# Altium PCB main.PcbDoc (part 1 of 2)
Units mm, origin at the board's own origin, x right, y up, seen from the top; angles counter-clockwise.
Board outline 42 x 60.8 mm, 6 copper layers (Layer 1, Layer 2, Layer3, Layer4, Layer 5, Layer 6), stack 0.816 mm thick; 77 components, 64 nets, 292 pads, 154 vias.
Unrouted connection lines stored in the file: 1.
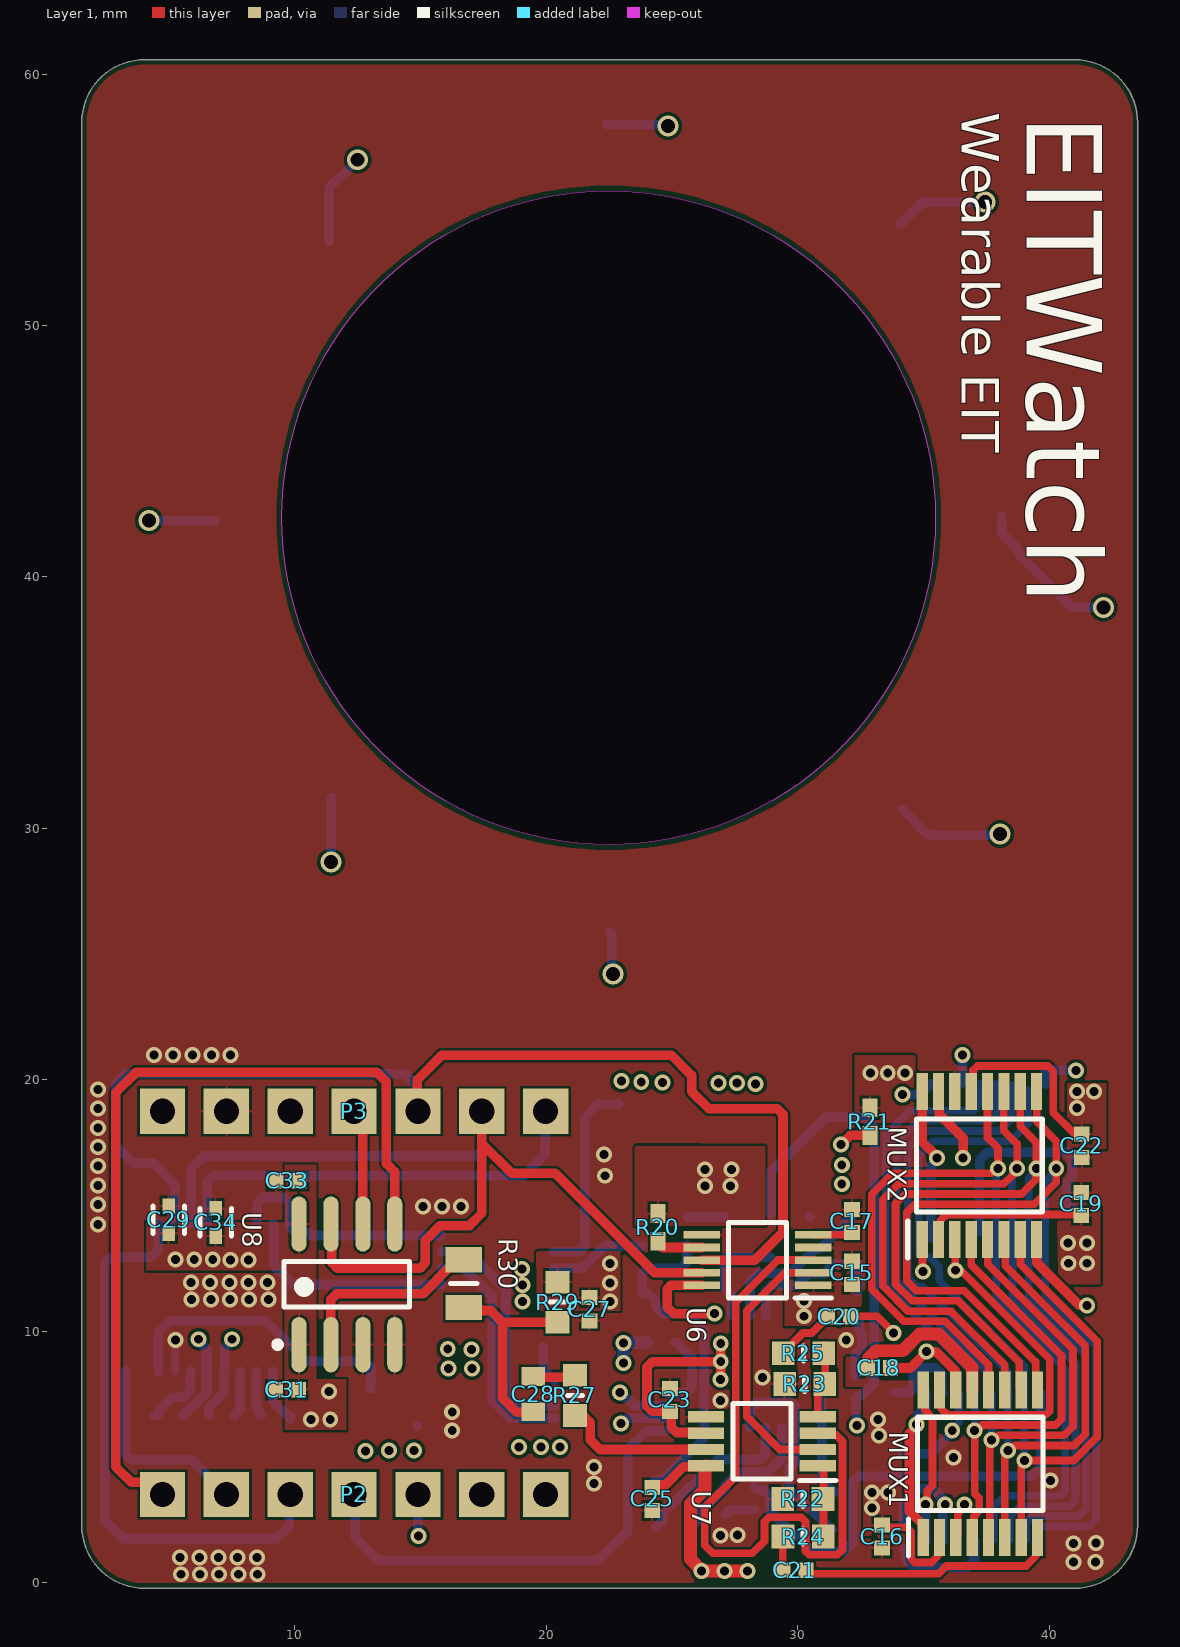
[diagram p0: Layer 1 view]
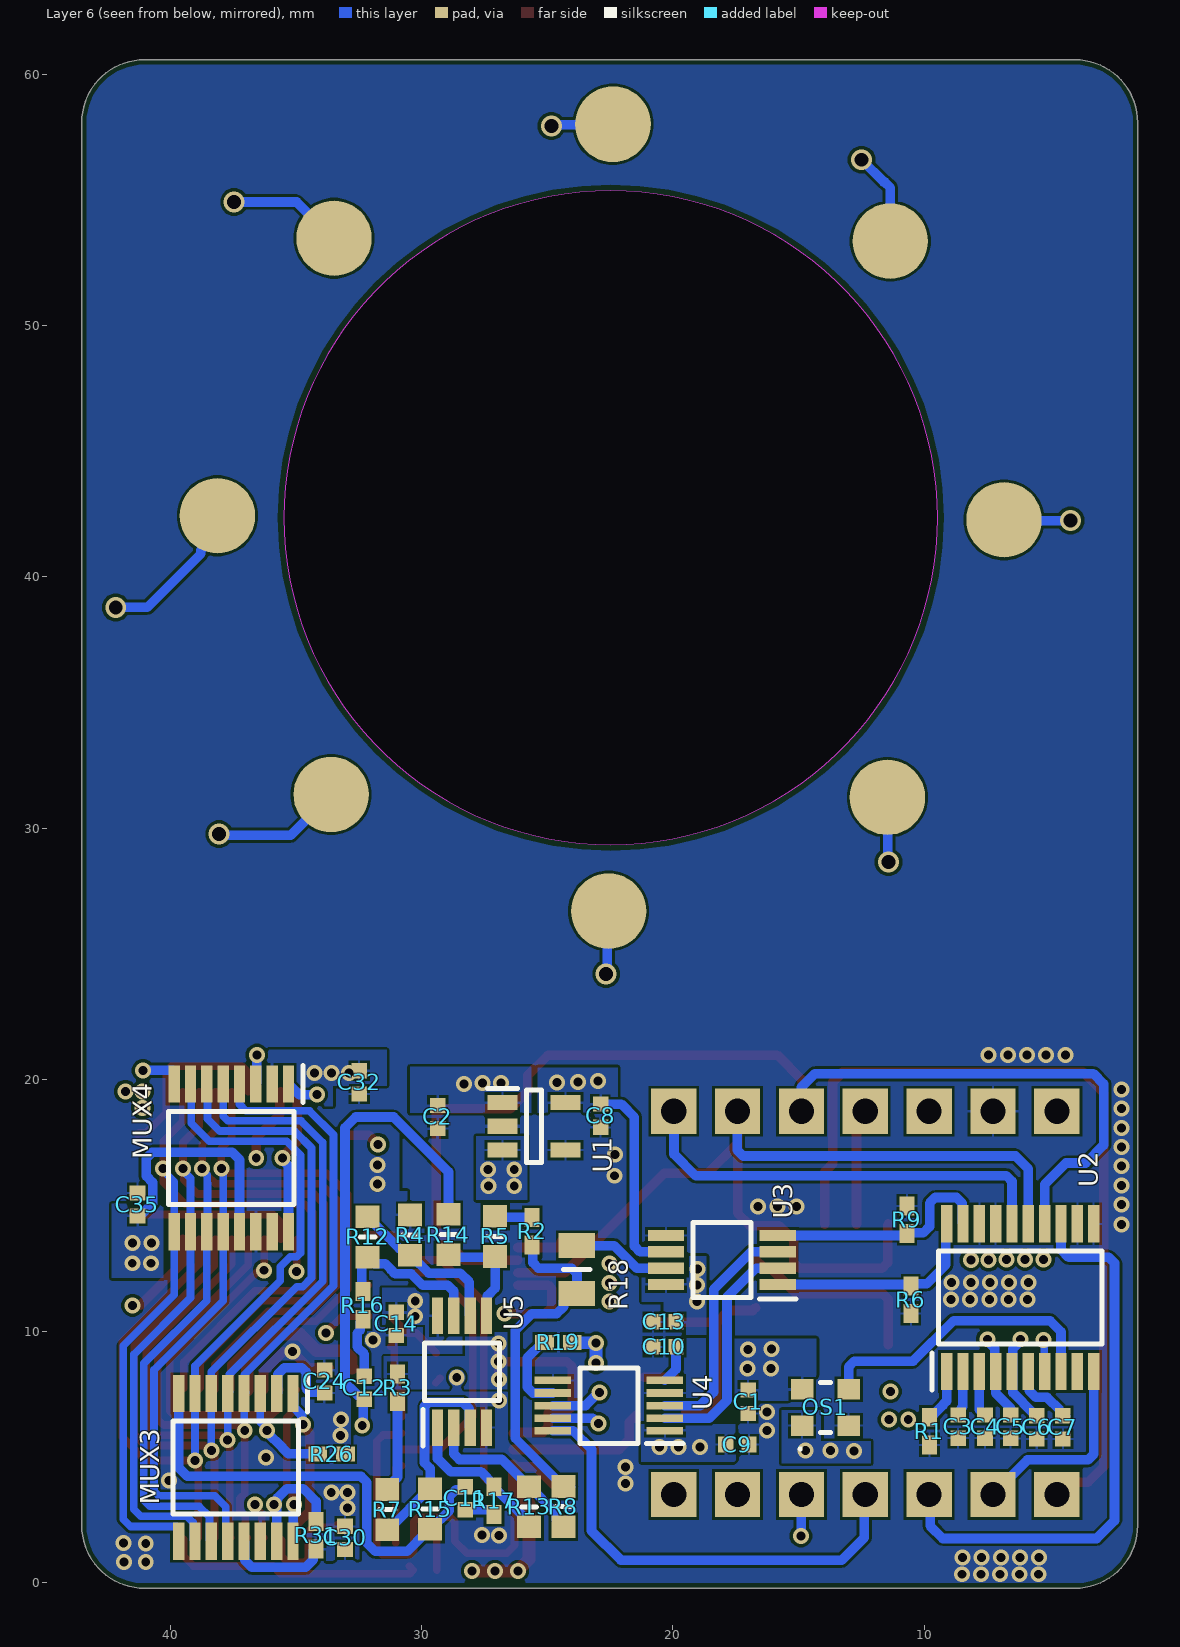
[diagram p1: Layer 6 view, seen from below]
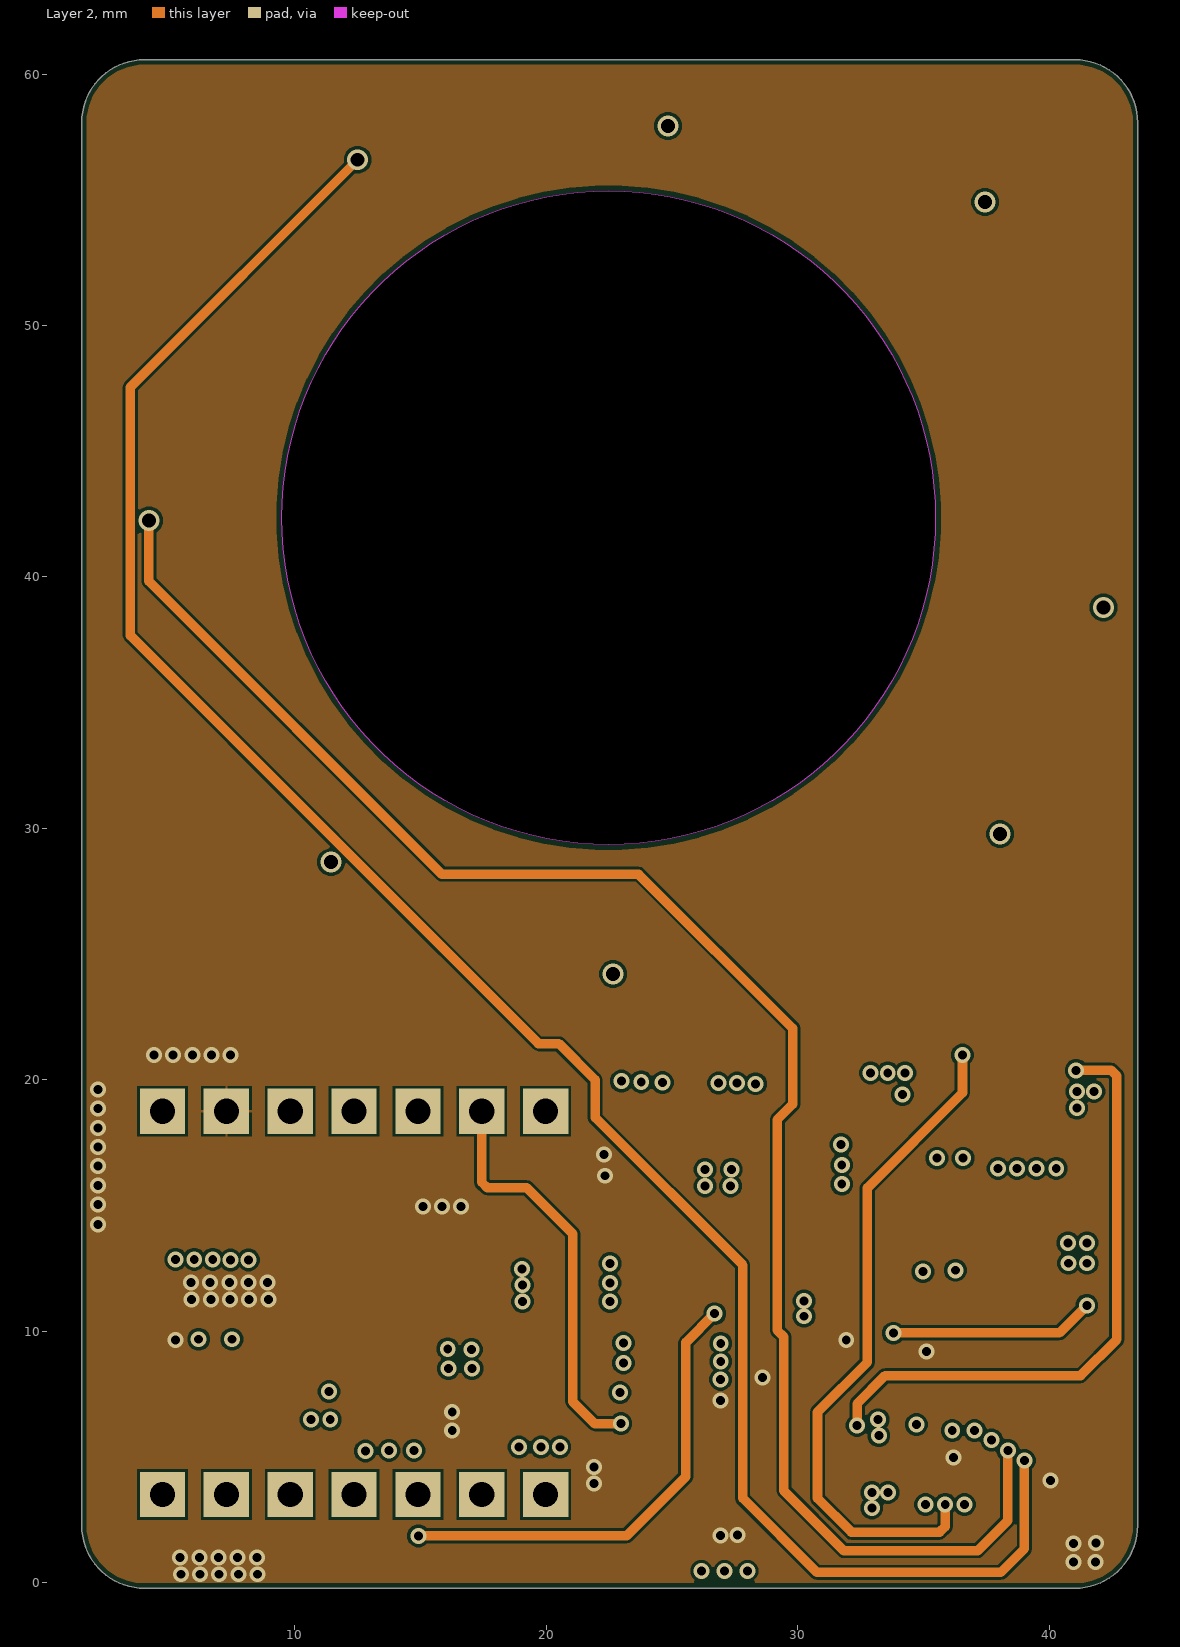
[diagram p2: Layer 2]
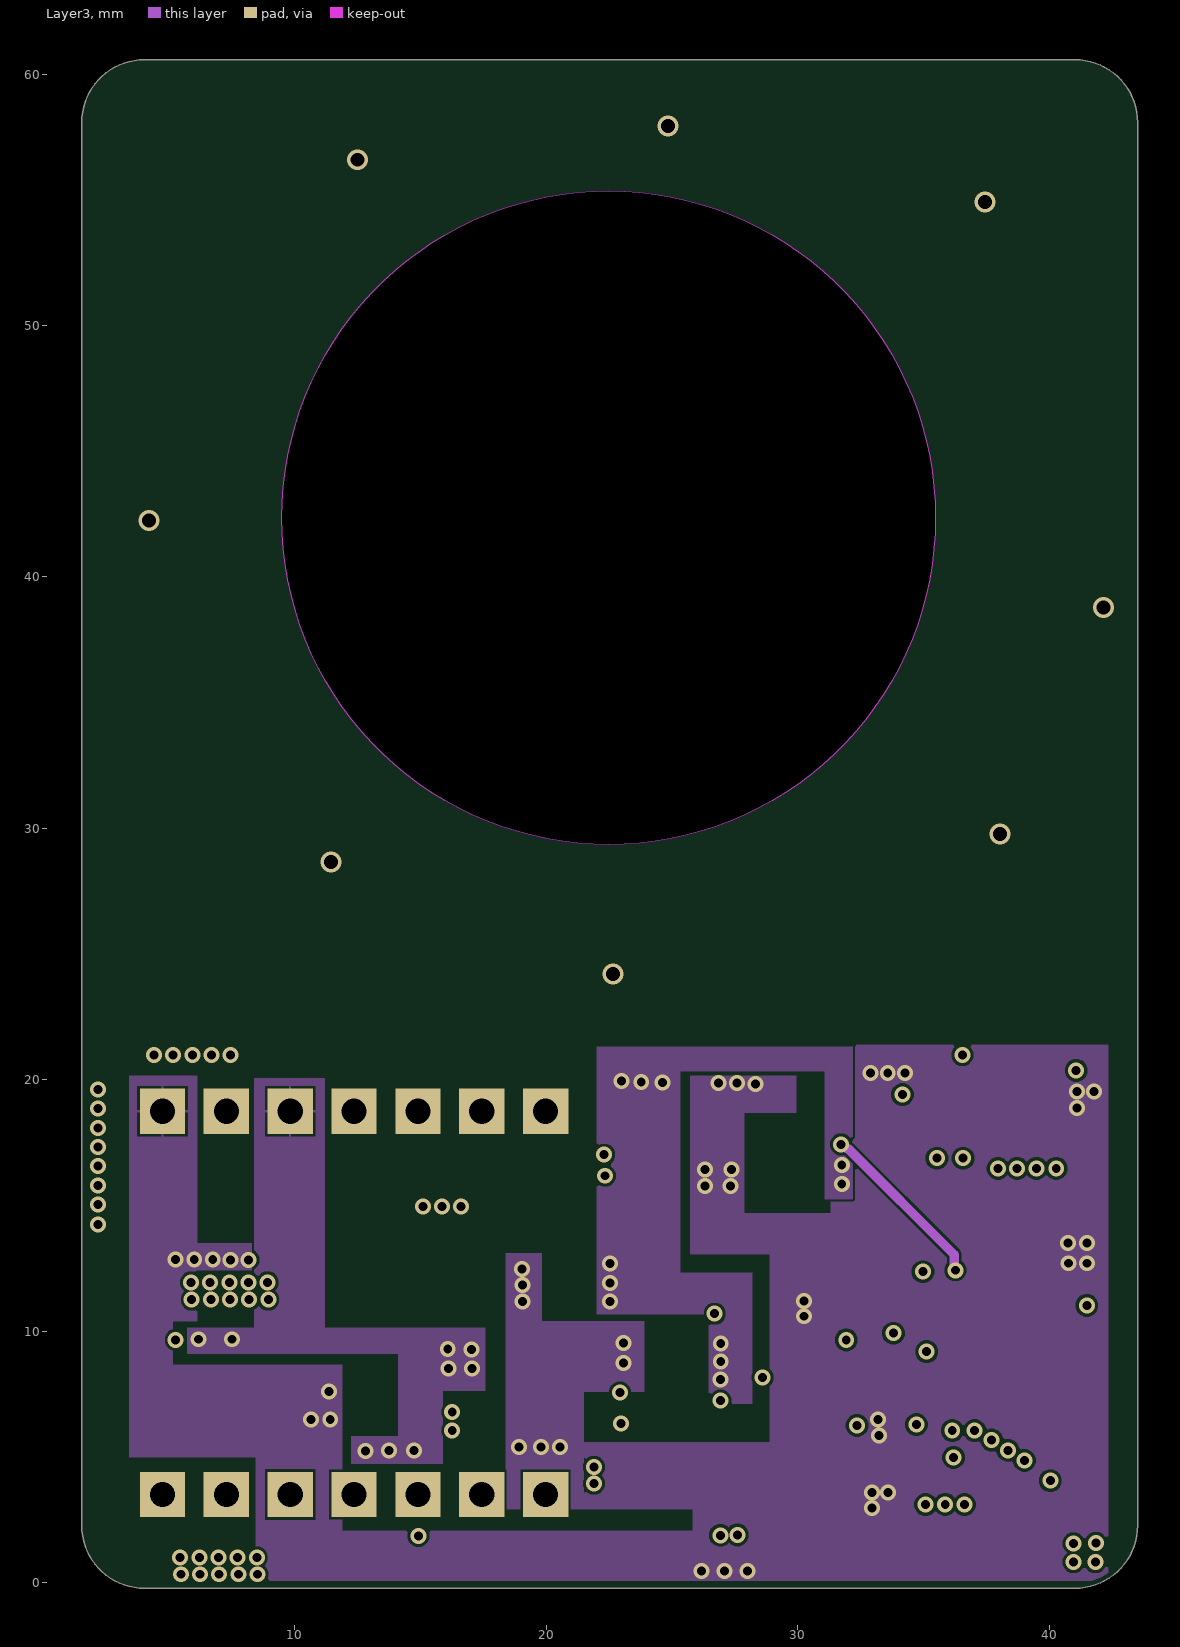
[diagram p3: Layer3]
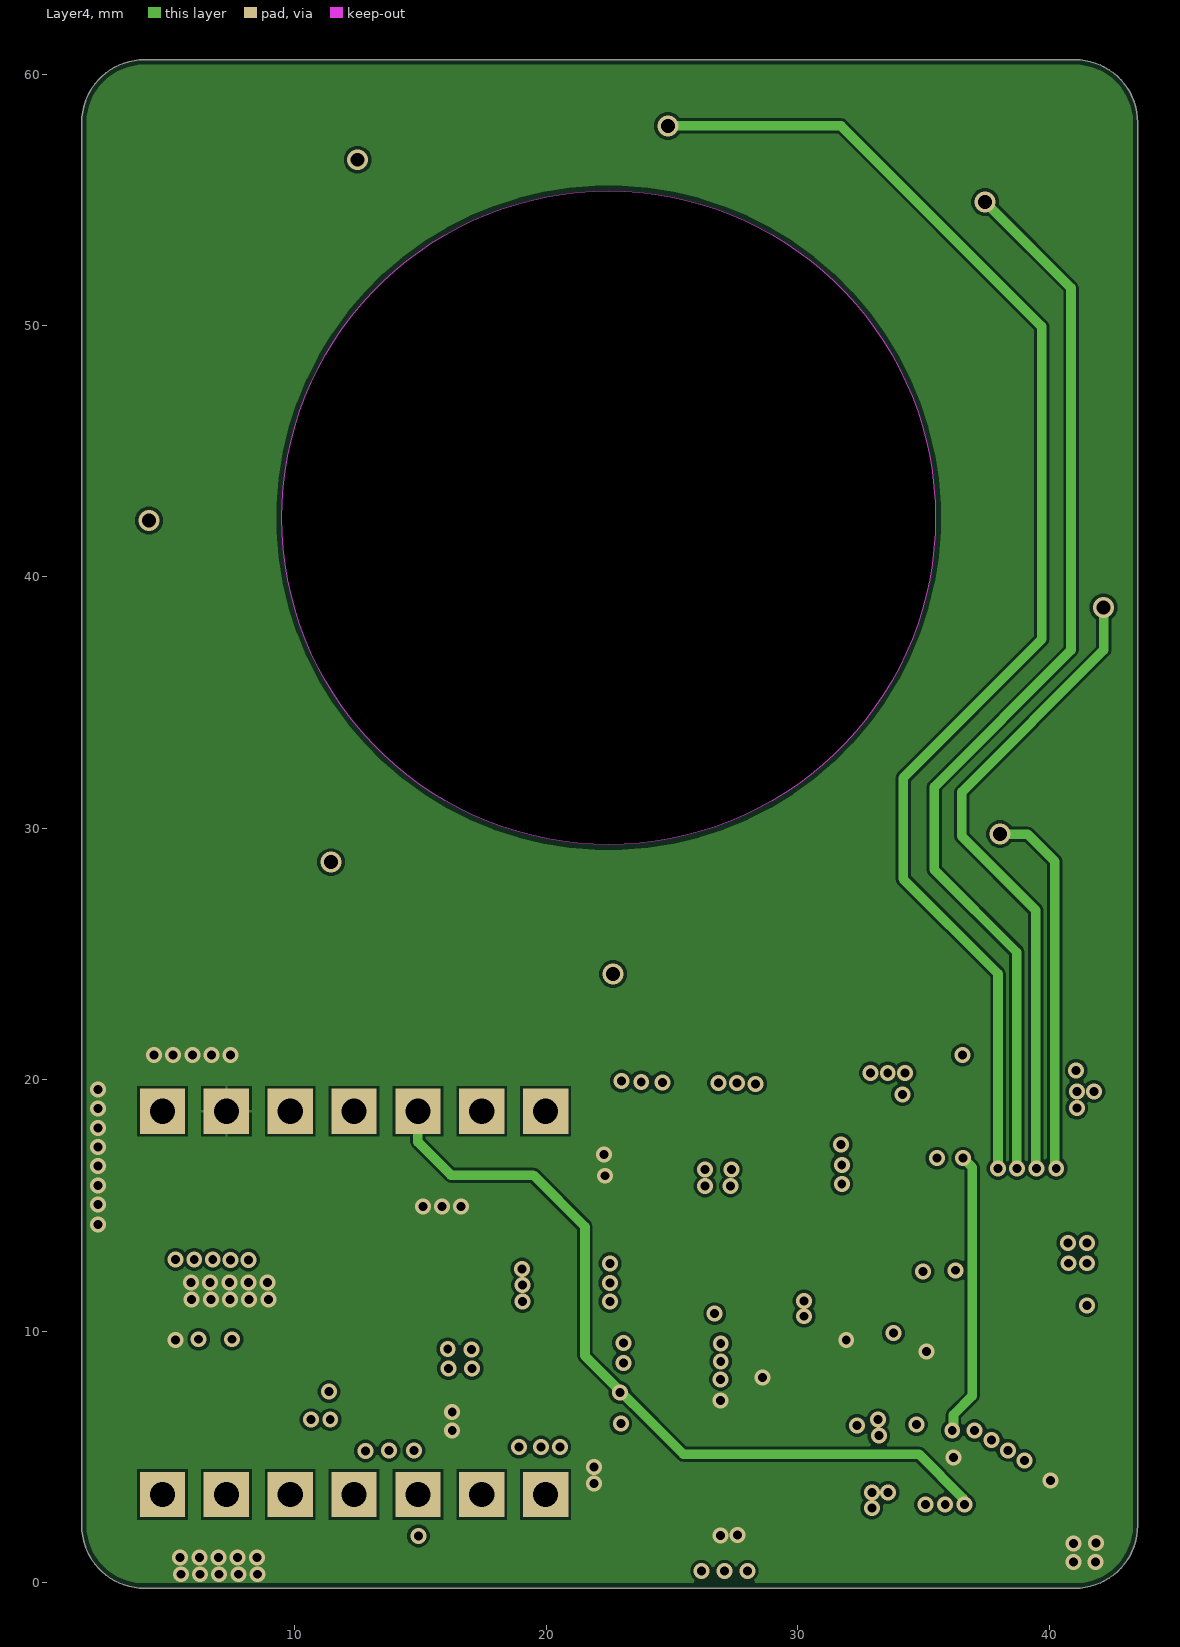
[diagram p4: Layer4]
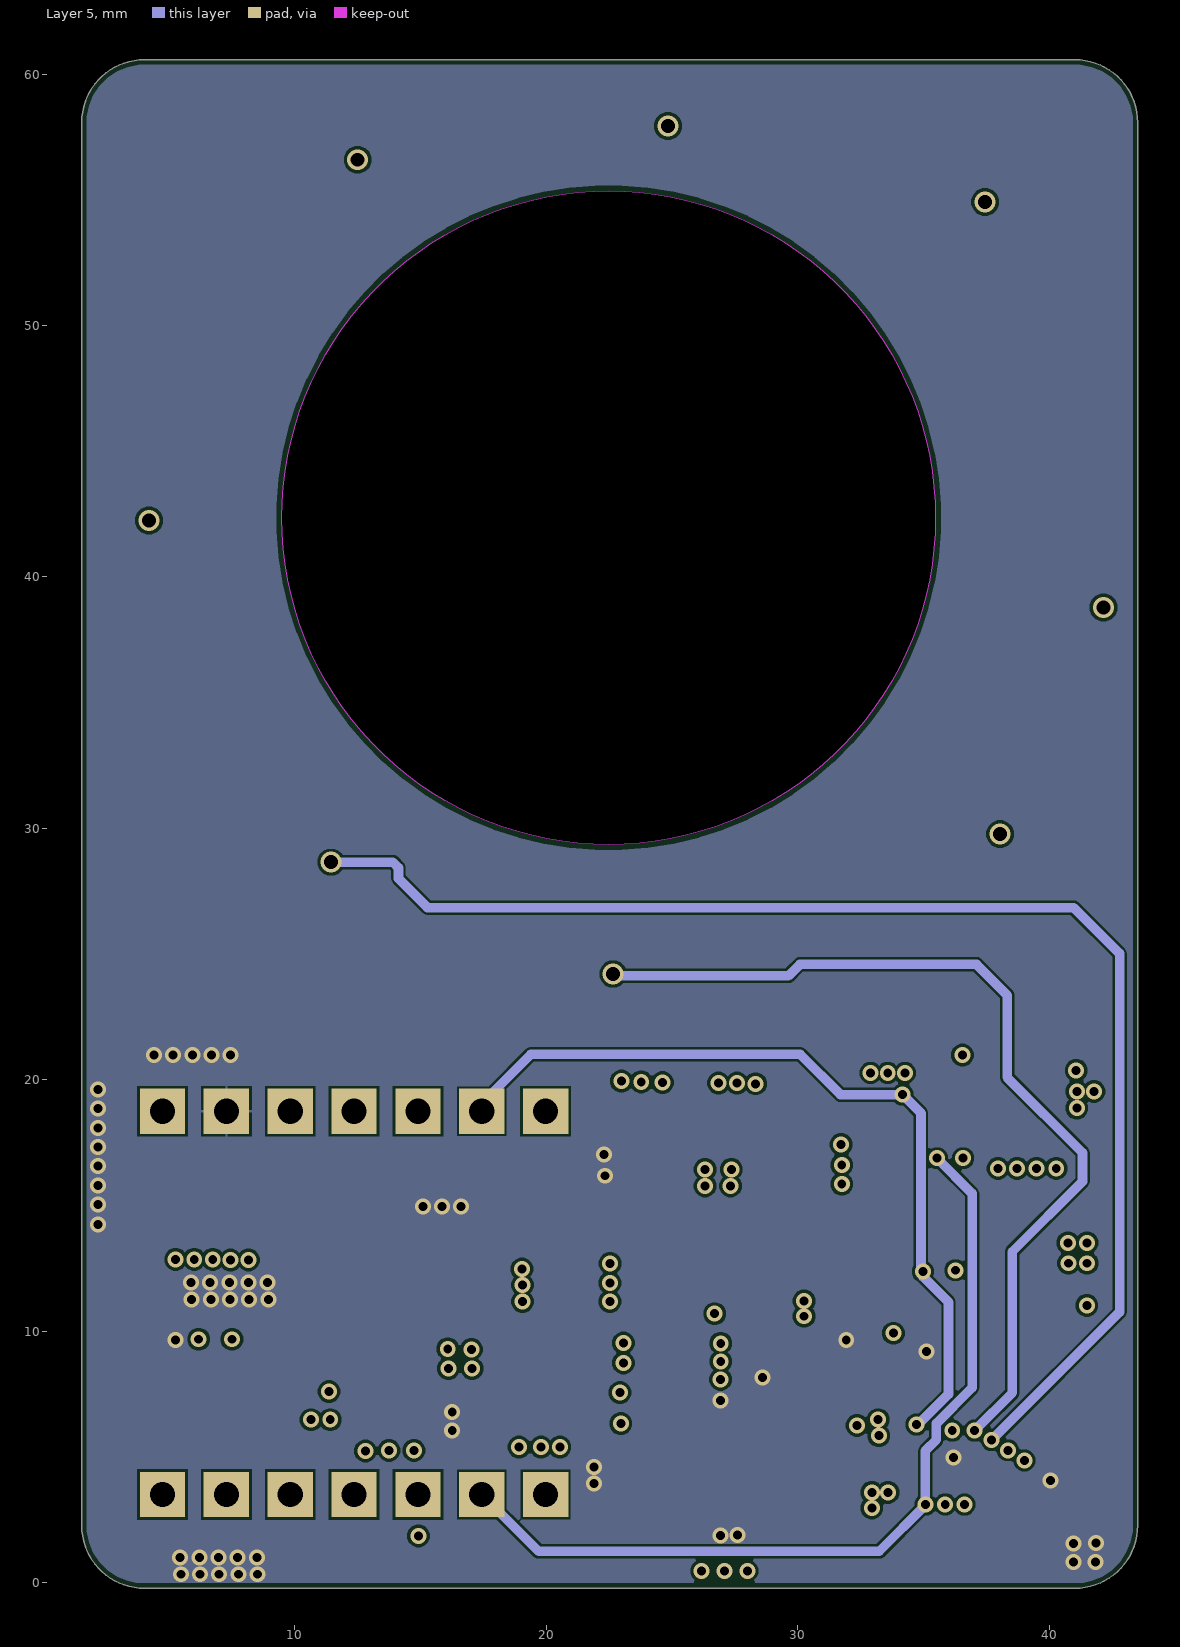
[diagram p5: Layer 5]

## Layer stack, top to bottom
Top Solder: solder mask 0.0102, Solder Resist, Dk 3.5
Layer 1: signal copper 0.0356
Dielectric 4: prepreg 0.0711, PP-006, Dk 4.1
Layer 2: signal copper 0.035
Dielectric 2: prepreg 0.0711, PP-006, Dk 4.1
Layer3: signal copper 0.035
Dielectric 1: dielectric 0.32, FR-4, Dk 4.8
Layer4: signal copper 0.035
Dielectric 3: prepreg 0.0711, PP-006, Dk 4.1
Layer 5: signal copper 0.035
Dielectric 5: prepreg 0.0711, PP-006, Dk 4.1
Layer 6: signal copper 0.0356
Bottom Solder: solder mask 0.0102, Solder Resist, Dk 3.5

## Board outline
1.518,2.271 1.518,58.071 cw(c4.018,58.071) 4.018,60.571 41.018,60.571 cw(c41.018,58.071) 43.518,58.071 43.518,2.271 cw(c41.018,2.271) 41.018,-0.229 4.018,-0.229 cw(c4.018,2.271)
cut-out: 22.477,29.351 cw(c22.477,42.351) 9.477,42.351 cw(c22.477,42.351) 22.477,55.351 cw(c22.477,42.351) 35.477,42.351 cw(c22.477,42.351)

## Design rules (kind name [scope] priority, off if disabled: settings)
BoardOutlineClearance [All] p1: gap=0.2 ignorepadtopadclearanceinfootprint=FALSE
Clearance [All] p1: gap=0.102 ignorepadtopadclearanceinfootprint=FALSE except(0.127: Arc-Via Track-Via SMDPad-Via THPad-Via Via-Via Via-Fill Via-Poly Via-Region Via-Text; 0.25: Arc-Hole Track-Hole SMDPad-Hole THPad-Hole Via-Hole Fill-Hole Poly-Hole Region-Hole Text-Hole)
ComponentClearance [All] p1: gap=0.102 collisioncheckmode=3 verticalgap=0.102 showdistances=TRUE
DiffPairsRouting [All] p1: maxlimit=0.102 minlimit=0.102 mostfreqgap=0.102 toplayer_minwidth=0.102 toplayer_maxwidth=1816.048 toplayer_prefwidth=0.102 midlayer1_minwidth=0.102 midlayer1_maxwidth=1816.048 midlayer1_prefwidth=0.102 midlayer2_minwidth=0.102 midlayer2_maxwidth=1816.048 midlayer2_prefwidth=0.102 midlayer3_minwidth=0.102 midlayer3_maxwidth=1816.048 midlayer3_prefwidth=0.102 midlayer4_minwidth=0.102 midlayer4_maxwidth=1816.048 midlayer4_prefwidth=0.102 bottomlayer_minwidth=0.102 bottomlayer_maxwidth=1816.048 bottomlayer_prefwidth=0.102 maxuncoupledlength=12.7
Height [All] p1: minheight=0 maxheight=1816.048 prefheight=12.7
HoleSize [All] p1: absolutevalues=TRUE maxlimit=6.3 minlimit=0.2 maxpercent=80.000 minpercent=20.000
HoleToHoleClearance [All] p1: gap=0.25 allowstackedmicrovias=FALSE
MinimumAnnularRing [All] p1: minimumring=0.076
MinimumSolderMaskSliver [All] p1: minsoldermaskwidth=0
PlaneClearance [All] p1: clearance=0.102
PlaneConnect PlaneConnectPowerPads [InPadClass('PowerPads')] p1: planeconnectstyle=Direct reliefexpansion=0.508 reliefentries=4 reliefconductorwidth=0.254 reliefairgap=0.254
PlaneConnect [All] p2: pad.planeconnectstyle=Relief pad.reliefexpansion=0.3 pad.reliefentries=4 pad.reliefconductorwidth=0.102 pad.reliefairgap=0.102 via.planeconnectstyle=Direct via.reliefexpansion=0.3 via.reliefentries=4 via.reliefconductorwidth=0.127 via.reliefairgap=0.127
PolygonConnect PolygonConnectPowerPads [All vs (InPadClass('PowerPads'))] p1: connectstyle=Direct reliefconductorwidth=0.254 reliefentries=4 polygonreliefangle="90 Angle" airgapwidth=0.254
PolygonConnect [All] p2: thpad.connectstyle=Relief thpad.reliefconductorwidth=0.102 thpad.reliefentries=4 thpad.polygonreliefangle="90 Angle" thpad.airgapwidth=0.102 smdpad.connectstyle=Relief smdpad.reliefconductorwidth=0.102 smdpad.reliefentries=4 smdpad.polygonreliefangle="90 Angle" smdpad.airgapwidth=0.102 via.connectstyle=Direct via.reliefconductorwidth=0.127 via.reliefentries=4 via.polygonreliefangle="90 Angle" via.airgapwidth=0.127
RoutingVias [All] p1: holewidth=0.2 width=0.45 viastyle="Through Hole" minholewidth=0.2 minwidth=0.45 maxholewidth=6.3 maxwidth=6.55
SilkToSilkClearance [All] p1: silktosilkclearance=0
SilkToSolderMaskClearance [IsPad] p1: minsilkscreentomaskgap=0.102 clearancetoexposedcopper=TRUE
SolderMaskExpansion [All] p1: expansion=0.075 istentingtop=FALSE
SupplyNets "Schematic Supply Nets_4" [InNet('+2V5')] p1: voltage=0.000
SupplyNets "Schematic Supply Nets_3" [InNet('+3V3')] p2: voltage=0.000
SupplyNets "Schematic Supply Nets_2" [InNet('GND')] p3: voltage=0.000
SupplyNets "Schematic Supply Nets" [InNet('+5V')] p4: voltage=0.000
Width [All] p1: maxlimit=1816.048 minlimit=0.102 preferedwidth=0.102
20 further rules are at their usual default settings.

## Classes and differential pairs
component class main: 22 C15 C16 C17 C18 C19 C20 C21 C22 C23 C24 C25 C27 C28 C29 C30 C31 C32 C33 C34 C35 MUX1 MUX2 MUX3 MUX4 P2 P3 R20 R21 R22 R23 R24 R25 R26 R27 R29 R30 R31 U6 U7 U8
component class AC_sch: C1 C2 C3 C4 C5 C6 C7 C8 C9 C10 C11 C12 C13 C14 OS1 R1 R2 R3 R4 R5 R6 R7 R8 R9 R12 R13 R14 R15 R16 R17 R18 R19 U1 U2 U3 U4 U5

## Components (designator, comment, footprint, x,y, rotation, side; value= is the part's Value field where it differs from the comment)
C1 "0.1u" CAPC1005X55N 17.012,7.191 r90 bottom
C2 "1uF" CAPC1005X55N 29.357,18.52 r270 bottom
C3 "10n" CAPC1005X55N 8.656,6.201 r90 bottom
C4 "10n" CAPC1005X55N 7.589,6.201 r270 bottom
C5 "0.1u" CAPC1005X55N 6.573,6.198 r90 bottom
C6 "0.1u" CAPC1005X55N 5.532,6.175 r90 bottom
C7 "0.1u" CAPC1005X55N 4.49,6.175 r90 bottom
C8 "1uF" CAPC1005X55N 22.88,18.568 r90 bottom
C9 "0.1u" CAPC1005X55N 17.441,5.49 r180 bottom
C10 "1uF" CAPC1005X55N 20.34,9.376 r180 bottom
C11 "2.2uF" CAPC1005X57N 28.265,3.353 r90 bottom
C12 "2.2uF" CAPC1005X57N 32.278,7.75 r270 bottom
C13 "0.1u" CAPC1005X55N 20.34,10.366 r180 bottom
C14 "0.1u" CAPC1005X55N 31.008,10.29 r90 bottom
C15 "0.1u" CAPC1005X55N 32.156,12.319 r90 top
C16 "0.1u" CAPC1005X55N 33.35,1.829 r90 top
C17 "1uF" CAPC1005X55N 32.156,14.376 r270 top
C18 "0.1u" CAPC1005X55N 33.223,8.534 r180 top
C19 "0.1u" CAPC1005X55N 41.275,15.062 r270 top
C20 "0.47n" CAPC1005X70N 31.648,10.566 r180 top
C21 "0.47n" CAPC1005X70N 29.873,0.485 r180 top
C22 "0.1u" CAPC1005X55N 41.3,17.374 r90 top
C23 "0.1u" CAPC1005X55N 24.917,7.265 r90 top
C24 "0.1u" CAPC1005X55N 33.858,8.001 r270 bottom
C25 "0.1u" CAPC1005X55N 24.206,3.327 r90 top
C27 "0.1u" CAPC1005X55N 21.717,10.871 r270 top
C28 "2.7n" CAPC1608X90N 19.482,7.493 r270 top
C29 "10uF" FP-0402-L_1_0_1-W_0_5_0_1-MFG 4.978,14.427 r90 top
C30 "0.1u" CAPC1005X55N 33.045,1.778 r90 bottom
C31 "0.1u" CAPC1005X55N 9.677,7.671 r180 top
C32 "0.1u" CAPC1005X55N 32.481,19.896 r90 bottom
C33 "0.1u" CAPC1005X55N 9.703,15.977 r0 top
C34 "10uF" FP-0402-L_1_0_1-W_0_5_0_1-MFG 6.845,14.326 r90 top
C35 "0.1u" CAPC1005X55N 41.3,15.037 r270 bottom
MUX1 "ADG738BRUZ" SOP65P640X120-16N 37.262,4.724 r90 top
MUX2 "ADG738BRUZ" SOP65P640X120-16N 37.224,16.586 r90 top
MUX3 "ADG738BRUZ" SOP65P640X120-16N 37.388,4.58 r270 bottom
MUX4 "ADG738BRUZ" SOP65P640X120-16N 37.567,16.891 r270 bottom
OS1 "ECS-2520MV-500-BL-TR" ECS2520MV500BLTR 13.939,6.963 r180 bottom
P2 "Header 1x7" "Header 1x7 male" 9.811,3.506 r0 top
P3 "Header 1x7" "Header 1x7 male" 9.811,18.746 r0 top
R1 "20k" RESC1005X40N 9.799,6.023 r90 bottom
R2 "1K" RESC1005X40N 25.603,13.97 r90 bottom
R3 "1K" RESC1005X40N 30.957,7.75 r270 bottom
R4 "47k" RESC1608X55N 30.455,13.818 r270 bottom
R5 "47k" RESC1608X55N 27.076,13.767 r270 bottom
R6 "220" RESC1005X40N 10.541,11.252 r90 bottom
R7 "47k" RESC1608X55N 31.363,2.899 r90 bottom
R8 "47k" RESC1608X55N 24.359,3.023 r90 bottom
R9 "220" RESC1005X40N 10.693,14.427 r270 bottom
R12 "47k" RESC1608X55N 32.151,13.745 r90 bottom
R13 "47k" RESC1608X55N 25.725,3.013 r90 bottom
R14 "47k" RESC1608X55N 28.931,13.843 r270 bottom
R15 "47k" RESC1608X55N 29.662,2.924 r90 bottom
R16 "1K" RESC1005X40N 32.334,11.024 r270 bottom
R17 "1K" RESC1005X40N 27.122,3.263 r270 bottom
R18 "0" RESC2012X65N 23.82,12.449 r90 bottom
R19 "10k" RESC1005X40N 24.556,9.554 r180 bottom
R20 "10k" RESC1005X40N 24.435,14.122 r90 top
R21 "10k" RESC1005X40N 32.872,18.336 r90 top
R22 "47k" RESC1608X55N 30.201,3.327 r180 top
R23 "47k" RESC1608X55N 30.277,7.899 r180 top
R24 "47k" RESC1608X55N 30.213,1.829 r180 top
R25 "47k" RESC1608X55N 30.226,9.119 r180 top
R26 "10k" RESC1005X40N 33.579,5.105 r180 bottom
R27 "4.7k" RESC1608X55N 21.133,7.442 r90 top
R29 "47k" RESC1608X55N 20.447,11.151 r270 top
R30 "0" RESC2012X65N 16.713,11.887 r90 top
R31 "10k" RESC1005X40N 34.194,1.884 r270 bottom
U1 "TLV73325PDBVT" SOT95P280X145-5N 25.527,18.148 r180 bottom
U2 "AD5930YRUZ" SOP65P640X120-20N 6.192,11.332 r90 bottom
U3 "AD8220ARMZ" SOP65P490X110-8N 18.054,12.83 r0 bottom
U4 "AD5270BRMZ-100" SOP50P490X110-10N 22.55,7.039 r0 bottom
U5 "ADA4841-2YRMZ" SOP65P490X110-8N 28.392,8.385 r90 bottom
U6 "AD5270BRMZ-100" SOP50P490X110-10N 28.397,12.827 r180 top
U7 "AD8220ARMZ" SOP65P490X110-8N 28.575,5.617 r180 top
U8 "AD7450BRZ" R-8_N 12.065,11.862 r90 top

## Footprints (in the part's own frame and the unit in brackets; to place one, negate y for a bottom-side part, rotate by r counter-clockwise, add the part's x,y. Pads: shape width x height; smd on the part's side, far side on the other; paste and mask are expansions set on the pad)
CAPC1005X55N [mm]
  rect 0.6x0.62 smd: 1(-0.46,0) 2(0.46,0)
  body extent -0.5,-0.25 0.5,0.25, height 0.55
CAPC1005X57N [mm]
  rect 0.61x0.63 smd: 1(-0.46,0) 2(0.46,0)
  body extent -0.43,-0.23 0.58,0.28, height 0.52
CAPC1005X70N [mm]
  rect 0.6x0.62 smd: 1(-0.46,0) 2(0.46,0)
  body extent -0.5,-0.25 0.5,0.25, height 0.5
CAPC1608X90N [mm]
  rect 0.75x0.94 smd: 1(-0.7,0) 2(0.7,0)
  body extent -0.8,-0.4 0.8,0.4, height 0.9
ECS2520MV500BLTR [mm]
  rect 0.9x0.8 smd: 1(-0.925,-0.725) 2(0.925,-0.725) 3(0.925,0.725) 4(-0.925,0.725)
  silkscreen extent -1.05,-1.7 0.2,1, body extent -1.3,-1.04 1.3,1.04, height 1
FP-0402-L_1_0_1-W_0_5_0_1-MFG [mm]
  rect 0.6x0.5 smd paste+0 mask+0: 1(-0.55,0) 2(0.55,0)
  silkscreen extent -0.55,-0.63 0.55,0.63, body extent -0.95,-0.4 0.95,0.4, height 0.25
"Header 1x7 male" [mm] "2.54mm"
  rect 1.8x1.8 hole 1: 1(-5.08,0) 2(-2.54,0) 3(0,0) 4(2.54,0) 5(5.08,0) 6(7.62,0) 7(10.16,0)
  body extent -6.35,-1.27 11.43,1.27, height 8.6
R-8_N [mm] "SOIC, 8-Leads, Body 4.9x3.9mm, Pitch 1.27mm, IPC Medium Density"
  oval 2.2x0.6 smd: 1(-2.4,1.905) 2(-2.4,0.635) 3(-2.4,-0.635) 4(-2.4,-1.905) 5(2.4,-1.905) 6(2.4,-0.635) 7(2.4,0.635) 8(2.4,1.905)
  silkscreen extent -2.52,-2.5 0.9,2.88, body extent -2,-2.5 2,2.5, height 1.75
RESC1005X40N [mm]
  rect 0.75x0.6 smd: 1(-0.55,0) 2(0.55,0)
  body extent -0.5,-0.25 0.5,0.25, height 0.4
RESC1608X55N [mm]
  rect 0.9x0.95 smd: 1(-0.8,0) 2(0.8,0)
  silkscreen extent 0,-0.3 0,0.3, body extent -0.8,-0.4 0.8,0.4, height 0.46
RESC2012X65N [mm]
  rect 1x1.45 smd: 1(-0.95,0) 2(0.95,0)
  silkscreen extent 0,-0.53 0,0.53, body extent -0.77,-0.4 0.77,0.4, height 0.46
SOP50P490X110-10N [mm]
  rect 1.45x0.3 smd: 1(-2.225,1) 2(-2.225,0.5) 3(-2.225,0) 4(-2.225,-0.5) 5(-2.225,-1) 6(2.225,-1) 7(2.225,-0.5) 8(2.225,0) 9(2.225,0.5) 10(2.225,1)
  silkscreen extent -2.95,-1.5 1.15,1.5, body extent -2.45,-1.5 2.45,1.5, height 0.95
SOP65P490X110-8N [mm]
  rect 1.45x0.45 smd: 1(-2.225,0.975) 2(-2.225,0.325) 3(-2.225,-0.325) 4(-2.225,-0.975) 5(2.225,-0.975) 6(2.225,-0.325) 7(2.225,0.325) 8(2.225,0.975)
  silkscreen extent -2.95,-1.5 1.15,1.55, body extent -2.45,-1.5 2.45,1.5, height 1
SOP65P640X120-16N [mm]
  rect 1.475x0.45 smd: 1(-2.938,2.275) 2(-2.938,1.625) 3(-2.938,0.975) 4(-2.938,0.325) 5(-2.938,-0.325) 6(-2.938,-0.975) 7(-2.938,-1.625) 8(-2.938,-2.275) 9(2.938,-2.275) 10(2.938,-1.625) 11(2.938,-0.975) 12(2.938,-0.325) 13(2.938,0.325) 14(2.938,0.975) 15(2.938,1.625) 16(2.938,2.275)
  silkscreen extent -3.67,-2.5 1.85,2.85, body extent -3.2,-2.5 3.2,2.5, height 1.2
SOP65P640X120-20N [mm]
  rect 1.475x0.45 smd: 1(-2.938,2.925) 2(-2.938,2.275) 3(-2.938,1.625) 4(-2.938,0.975) 5(-2.938,0.325) 6(-2.938,-0.325) 7(-2.938,-0.975) 8(-2.938,-1.625) 9(-2.938,-2.275) 10(-2.938,-2.925) 11(2.938,-2.925) 12(2.938,-2.275) 13(2.938,-1.625) 14(2.938,-0.975) 15(2.938,-0.325) 16(2.938,0.325) 17(2.938,0.975) 18(2.938,1.625) 19(2.938,2.275) 20(2.938,2.925)
  silkscreen extent -3.67,-3.25 1.85,3.5, body extent -3.2,-3.25 3.2,3.25, height 1.2
SOT95P280X145-5N [mm]
  rect 1.2x0.6 smd: 1(-1.25,0.95) 2(-1.25,0) 3(-1.25,-0.95) 4(1.25,-0.95) 5(1.25,0.95)
  silkscreen extent -1.85,-1.45 0.3,1.5, body extent -1.4,-1.45 1.4,1.45, height 1.2

## Part data
C1 C5 C6 C7 C9 C13 C14 C15 C16 C18 C19 C22 C23 C24 C25 C27 C30 C31 C32 C33 C35: library part CL05B104KO5NNNC, "Capacitor", Manufacturer_Name=SAMSUNG, Mouser Part Number=187-CL05B104KO5NNNC, Arrow Part Number=CL05B104KO5NNNC, Arrow Price/Stock=https://www.arrow.com/en/products/cl05b104ko5nnnc/samsung-electro-mechanics?utm_currency=USD&region=nac, Datasheet Link=https://datasheet.datasheetarchive.com/originals/distributors/Datasheets-DGA10/2408147.pdf, Height=0.55mm, Manufacturer_Part_Number=CL05B104KO5NNNC, Mouser Price/Stock=https://www.mouser.co.uk/ProductDetail/Samsung-Electro-Mechanics/CL05B104KO5NNNC?qs=hqM3L16%252BxlfT2SKOuAUq6Q%3D%3D
C2 C8 C10 C17: library part CL05A105KP5NNNC, "Capacitor", Manufacturer_Name=SAMSUNG, Mouser Part Number=187-CL05A105KP5NNNC, Arrow Part Number=CL05A105KP5NNNC, Arrow Price/Stock=https://www.arrow.com/en/products/cl05a105kp5nnnc/samsung-electro-mechanics?region=nac, Datasheet Link=https://www.arrow.com/en/products/cl05a105kp5nnnc/samsung-electro-mechanics, Height=0.55mm, Manufacturer_Part_Number=CL05A105KP5NNNC, Mouser Price/Stock=https://www.mouser.co.uk/ProductDetail/Samsung-Electro-Mechanics/CL05A105KP5NNNC?qs=X6jEic%2FHinBsUeNeR9HD7w%3D%3D
C3 C4: library part CL05B103KB5NNNC, "Capacitor", Manufacturer_Name=SAMSUNG, Mouser Part Number=187-CL05B103KB5NNNC, Arrow Part Number=CL05B103KB5NNNC, Arrow Price/Stock=https://www.arrow.com/en/products/cl05b103kb5nnnc/samsung-electro-mechanics?utm_currency=USD&region=nac, Datasheet Link=https://datasheet.datasheetarchive.com/originals/distributors/Datasheets-DGA10/2407958.pdf, Height=0.55mm, Manufacturer_Part_Number=CL05B103KB5NNNC, Mouser Price/Stock=https://www.mouser.co.uk/ProductDetail/Samsung-Electro-Mechanics/CL05B103KB5NNNC?qs=349EhDEZ59pcaIbMQHo3bQ%3D%3D
C11 C12: library part CL05A225MQ5NSNC, "Capacitor", Manufacturer_Name=SAMSUNG, Mouser Part Number=187-CL05A225MQ5NSNC, Arrow Part Number=CL05A225MQ5NSNC, Arrow Price/Stock=https://www.arrow.com/en/products/cl05a225mq5nsnc/samsung-electro-mechanics?utm_currency=USD&region=nac, Datasheet Link=https://datasheet.datasheetarchive.com/originals/dk/DKDS-19/372932.pdf, Height=0.57mm, Manufacturer_Part_Number=CL05A225MQ5NSNC, Mouser Price/Stock=https://www.mouser.co.uk/ProductDetail/Samsung-Electro-Mechanics/CL05A225MQ5NSNC?qs=X6jEic%2FHinC0eBcvtpjFyQ%3D%3D
C20 C21: library part GRM1555C1H431JA01D, "Capacitor", Manufacturer_Name="Murata Electronics", Mouser Part Number=81-GRM1555C1H431JA1D, Datasheet Link=https://search.murata.co.jp/Ceramy/image/img/A01X/G101/ENG/GRM1555C1H431JA01-01A.pdf, Height=0.7mm, Manufacturer_Part_Number=GRM1555C1H431JA01D, Mouser Price/Stock=https://www.mouser.co.uk/ProductDetail/Murata-Electronics/GRM1555C1H431JA01D?qs=MY6wChARw2wtFsv3uU537Q%3D%3D
C28: library part GRM1885C1H272JA01D, "Capacitor", Manufacturer_Name="Murata Electronics", Mouser Part Number=81-GRM185C1H272JA01D, Arrow Part Number=GRM1885C1H272JA01D, Arrow Price/Stock=https://www.arrow.com/en/products/grm1885c1h272ja01d/murata-manufacturing, Datasheet Link=https://search.murata.co.jp/Ceramy/image/img/A01X/G101/ENG/GRM1885C1H272JA01-01A.pdf, Height=0.9mm, Manufacturer_Part_Number=GRM1885C1H272JA01D, Mouser Price/Stock=https://www.mouser.co.uk/ProductDetail/Murata-Electronics/GRM1885C1H272JA01D?qs=%2FEhSLMV8HUQlL5ZggNQk6g%3D%3D
C29 C34: library part CMP-04427-000034-1, "CAP CER 10UF 4V X5R 0402", RoHS Compliant=Yes
MUX1 MUX2 MUX3 MUX4: "Integrated Circuit", Manufacturer_Name="Analog Devices", Mouser Part Number=584-ADG738BRUZ, Arrow Part Number=ADG738BRUZ, Arrow Price/Stock=https://www.arrow.com/en/products/adg738bruz/analog-devices, Datasheet Link=http://www.analog.com/media/en/technical-documentation/data-sheets/ADG738_739.pdf, Height=1.2mm, Manufacturer_Part_Number=ADG738BRUZ, Mouser Price/Stock=https://www.mouser.co.uk/ProductDetail/Analog-Devices/ADG738BRUZ?qs=BpaRKvA4VqFBoYY1IG1vMw%3D%3D
OS1: "Crystal or Oscillator", Manufacturer_Name=ECS, Mouser Part Number=520-2520MV-500-BL-TR, Arrow Part Number=ECS-2520MV-500-BL-TR, Arrow Price/Stock=https://www.arrow.com/en/products/ecs-2520mv-500-bl-tr/ecs-international?region=nac, Datasheet Link=https://ecsxtal.com/store/pdf/ECS-2520MV.pdf, Height=0.9mm, Manufacturer_Part_Number=ECS-2520MV-500-BL-TR, Mouser Price/Stock=https://www.mouser.co.uk/ProductDetail/ECS/ECS-2520MV-500-BL-TR?qs=DRkmTr78QARre2%252BXmq63mg%3D%3D
R1: library part RC0402FR0720KL, "Resistor", Manufacturer_Name=KEMET, Arrow Part Number=RC0402FR0720KL, Arrow Price/Stock=https://www.arrow.com/en/products/rc0402fr-0720kl/yageo, Datasheet Link=http://www.yageo.com/documents/recent/PYu-RC0402_51_RoHS_L_6_r.pdf, Height=0.4mm, Manufacturer_Part_Number=RC0402FR0720KL
R2 R3 R16 R17: library part 0402WGF1001TCE, "Resistor", Manufacturer_Name="UNI-ROYAL(Uniroyal Elec)", Datasheet Link=https://datasheet.lcsc.com/szlcsc/Uniroyal-Elec-0402WGF1001TCE_C11702.pdf, Height=0.4mm, Manufacturer_Part_Number=0402WGF1001TCE
R4 R5 R7 R8 R12 R13 R14 R15 R22 R23 R24 R25 R29: library part 0603WAF4702T5E, "Resistor", Manufacturer_Name="UNI-ROYAL(Uniroyal Elec)", Datasheet Link=https://datasheet.lcsc.com/szlcsc/Uniroyal-Elec-0603WAF4702T5E_C25819.pdf, Height=0.55mm, Manufacturer_Part_Number=0603WAF4702T5E
R6 R9: library part 0402WGF2200TCE, "Resistor", Manufacturer_Name=ROYALOHM, Mouser Part Number=303-0402WGF2200TCE, Datasheet Link=https://www2.mouser.com/datasheet/2/1365/1-3044649.pdf, Height=0.4mm, Manufacturer_Part_Number=0402WGF2200TCE, Mouser Price/Stock=https://www.mouser.co.uk/ProductDetail/Royalohm/0402WGF2200TCE?qs=e8oIoAS2J1RP9vRYNvZ%252BDQ%3D%3D
R18 R30: library part CPF0805B10RE1, "Resistor", Manufacturer_Name="TE Connectivity", Mouser Part Number=279-CPF0805B10RE1, Arrow Part Number=CPF0805B10RE1, Arrow Price/Stock=https://www.arrow.com/en/products/cpf0805b10re1/te-connectivity?region=nac, Datasheet Link=http://docs-europe.electrocomponents.com/webdocs/13d1/0900766b813d116f.pdf, Height=0.65mm, Manufacturer_Part_Number=CPF0805B10RE1, Mouser Price/Stock=https://www.mouser.co.uk/ProductDetail/TE-Connectivity-Holsworthy/CPF0805B10RE1?qs=qj6TO2nKJqjxTen6wABuaQ%3D%3D
R19 R20 R21 R26 R31: library part RC0402JR-0710KL, "Resistor", Manufacturer_Name=YAGEO, Mouser Part Number=603-RC0402JR-0710KL, Arrow Part Number=RC0402JR-0710KL, Arrow Price/Stock=https://www.arrow.com/en/products/rc0402jr-0710kl/yageo?region=nac, Datasheet Link=https://www.yageo.com/upload/media/product/productsearch/datasheet/rchip/PYu-RC_Group_51_RoHS_L_12.pdf, Height=0.4mm, Manufacturer_Part_Number=RC0402JR-0710KL, Mouser Price/Stock=https://www.mouser.co.uk/ProductDetail/YAGEO/RC0402JR-0710KL?qs=V1yeUXFNrkk4BhFptVo0Rw%3D%3D
R27: library part 0603WAF4701T5E, "Resistor", Manufacturer_Name="UNI-ROYAL(Uniroyal Elec)", Datasheet Link=https://datasheet.lcsc.com/szlcsc/Uniroyal-Elec-0603WAF4701T5E_C23162.pdf, Height=0.55mm, Manufacturer_Part_Number=0603WAF4701T5E
U1: "Integrated Circuit", Manufacturer_Name="Texas Instruments", Mouser Part Number=595-TLV73325PDBVT, Arrow Part Number=TLV73325PDBVT, Arrow Price/Stock=https://www.arrow.com/en/products/tlv73325pdbvt/texas-instruments, Datasheet Link=http://www.ti.com/lit/gpn/TLV733P, Height=1.45mm, Manufacturer_Part_Number=TLV73325PDBVT, Mouser Price/Stock=https://www.mouser.co.uk/ProductDetail/Texas-Instruments/TLV73325PDBVT?qs=ifm8N2KdrcboKl2OgYRRdw%3D%3D
U2: "Integrated Circuit", Manufacturer_Name="Analog Devices", Mouser Part Number=584-AD5930YRUZ, Arrow Part Number=AD5930YRUZ, Arrow Price/Stock=https://www.arrow.com/en/products/ad5930yruz/analog-devices?region=nac, Datasheet Link=https://datasheet.datasheetarchive.com/originals/distributors/Datasheets-4/DSA-67194.pdf, Height=1.2mm, Manufacturer_Part_Number=AD5930YRUZ, Mouser Price/Stock=https://www.mouser.co.uk/ProductDetail/Analog-Devices/AD5930YRUZ?qs=NmRFExCfTkFA5qWdGRGhzQ%3D%3D
U3 U7: "Integrated Circuit", Manufacturer_Name="Analog Devices", Mouser Part Number=584-AD8220ARMZ, Arrow Part Number=AD8220ARMZ, Arrow Price/Stock=https://www.arrow.com/en/products/ad8220armz/analog-devices?utm_currency=USD&region=europe, Datasheet Link=http://www.analog.com/static/imported-files/data_sheets/AD8220.pdf, Height=1.1mm, Manufacturer_Part_Number=AD8220ARMZ, Mouser Price/Stock=https://www.mouser.co.uk/ProductDetail/Analog-Devices/AD8220ARMZ?qs=%2FtpEQrCGXCySRYIeTivM6A%3D%3D
U4 U6: "Integrated Circuit", Manufacturer_Name="Analog Devices", Mouser Part Number=584-AD5270BRMZ-100, Arrow Part Number=AD5270BRMZ-100, Arrow Price/Stock=https://www.arrow.com/en/products/ad5270brmz-100/analog-devices?region=europe, Datasheet Link=https://www.analog.com/media/en/technical-documentation/data-sheets/ad5270_5271.pdf, Height=1.1mm, Manufacturer_Part_Number=AD5270BRMZ-100, Mouser Price/Stock=https://www.mouser.co.uk/ProductDetail/Analog-Devices/AD5270BRMZ-100?qs=NmRFExCfTkFpgTn7ufWp4w%3D%3D
U5: "Integrated Circuit", Manufacturer_Name="Analog Devices", Mouser Part Number=584-ADA4841-2YRMZ, Arrow Part Number=ADA4841-2YRMZ, Arrow Price/Stock=https://www.arrow.com/en/products/ada4841-2yrmz/analog-devices?utm_currency=USD&region=nac, Datasheet Link=https://datasheet.datasheetarchive.com/originals/distributors/Datasheets-SFU1/DSASFU10004447.pdf, Height=1.1mm, Manufacturer_Part_Number=ADA4841-2YRMZ, Mouser Price/Stock=https://www.mouser.co.uk/ProductDetail/Analog-Devices/ADA4841-2YRMZ?qs=BpaRKvA4VqEiAK4J4giIjQ%3D%3D
U8: library part CMP-0313-01330-2, "Single 12-Bit Analog-to-Digital Converter with Serial Interface, 1MSPS, -40 to +85 degC, R-8, Pb-Free, Tube", Generic Part Number=AD7450, Manufacturer="Analog Devices", Channels=1, Code_IPC=SOIC127P600-8, Code_JEDEC=MS-012-AA, ComponentLink1Description="Manufacturer URL", ComponentLink1URL=http://www.analog.com/en/index.html, ComponentLink2Description=Datasheet, ComponentLink2URL=http://www.analog.com/static/imported-files/data_sheets/AD7450.pdf, ComponentLink3Description="Package Specification", ComponentLink3URL=http://www.analog.com/static/imported-files/packages/PKG_PDF/SOIC_Narrow%20(R)/R_8.pdf, ComponentLink4Description="Product URL", ComponentLink4URL=http://www.analog.com/en/analog-to-digital-converters/ad-converters/ad7450/products/product.html, DatasheetVersion=Rev.A, Interface=Ser, Mounting Technology="Surface Mount", PackageDescription="8-Lead Standard Small Outline Package [SOIC_N] Narrow Body", PackageReference=R-8, PackageVersion=060506-A, Packing=Tube, PartNumber=AD7450BRZ, Resolution (Bits)=12, RoHS=Y, Throughput Rate (SPS)=1M

## Free pads (board coordinates)
  round 3 smd far side: 5(22.377,58.014) 5(22.396,57.995) 6(11.358,53.356) 7(6.833,42.27) 8(11.472,31.232) 9(22.557,26.707) 10(33.596,31.346) 11(38.121,42.431) 12(33.482,53.469)

## Via types
v1: diameter 0.635, hole 0.356, Layer 1 to Layer 6, tented both sides, 146 vias
v2: diameter 0.835, hole 0.556, Layer 1 to Layer 6, tented both sides, 8 vias

## Nets (pads, with @x,y where several pads share a name; then routed paths per layer and width w, separated by ;. In a path a pad name is that pad's centre, name@x,y a point inside that pad or via, vN(x,y) a via of type N, cw(c..) or ccw(c..) an arc to the next point about the centre after c; other vN are vias at no path point)
+2V5: C8.2 C23.1 C27.1 R3.1 R4.1 R29.1 U1.5 U3.6 U7.6 | length 17
  Layer 1 w0.381: C23.1 24.226,6.805 24.003,7.028 24.003,8.565 24.226,8.788 v1(26.937,8.788) v1(26.937,9.516) ; C23.1@24.961,6.762 24.961,6.193 25.184,5.969 26.322,5.969 U7.6 ; v1(26.929,8.076) 26.933,8.08 v1@26.933,8.637
  Layer 6 w0.381: U3.6 21.31,13.155 21.534,13.378 21.534,18.508 22.054,19.028 C8.2 ; R4.1@30.449,14.545 R4.1@30.474,14.545 ; v1@31.75,15.821 v1(31.75,15.85)
  other v1: 22.53,11.176 22.53,11.913 22.534,12.695 31.75,16.612 24.613,19.888 23.774,19.914 22.987,19.942
+3V3: C1.2 C5.2 C6.2 OS1.1 OS1.4 P3.3 U2.4 U2.5 | length 7
  Layer 6 w0.381: C6.2@5.533,6.637 5.641,6.745 5.674,6.745 6.482,7.554 6.482,8.327 6.517,8.361 U2.5 6.482,8.428 6.482,9.298 6.172,9.609 v1(6.172,9.677) ; C5.2 6.573,6.937 7.167,7.531 U2.4 7.201,8.428 7.201,9.317 7.493,9.609 v1(7.493,9.677) ; OS1.1@14.861,6.235 OS1.1
  other v1: 12.802,5.232 13.741,5.258 14.732,5.258 16.104,8.509 17.043,8.509 17.018,9.271 16.078,9.296
+5V: C2.1 C9.1 C13.2 C14.2 C15.1 C16.2 C18.2 C19.2 C22.2 C24.2 C25.2 C29.1 C30.2 C31.1 C32.2 C33.2 C34.1 C35.2 MUX1.2 MUX1.13 MUX2.2 MUX2.13 MUX3.2 MUX3.13 MUX4.2 MUX4.13 P3.1 R19.2 R20.2 R21.2 R26.2 R31.2 U1.1 U1.3 U3.8 U4.1 U5.8 U6.1 U7.8 U8.1 U8.8 | length 52.5
  Layer 1 w0.305: C15.1@32.124,11.827 C15.1 ; C16.2 33.437,2.202 34.329,2.202 34.508,2.023 34.508,0.944 34.657,0.795 35.317,0.795 35.564,1.042 35.564,1.684 MUX1.2@35.637,1.756 ; MUX2.2 35.671,13.721 35.671,14.392 35.919,14.64 C19.2@41.257,14.64 ; MUX2.13 36.971,19.597 36.971,20.37 37.15,20.549 39.94,20.549 40.157,20.331 40.157,18.694 40.972,17.88 41.254,17.88 C22.2
  Layer 1 w0.381: C25.2 24.316,3.897 24.75,3.897 25.461,4.607 26.315,4.607 U7.8
  Layer 1 w0.508: v1(26.162,0.457) 26.162,0.492 25.73,0.923 25.73,3.131 26.309,3.71 26.309,4.6 U7.8 ; v1@26.209,0.493 26.209,0.469 26.221,0.457 v1(27.086,0.457) ; v1@27.086,0.502 27.131,0.457 v1(27.997,0.457) ; C18.2 32.809,8.58 32.809,8.923 33.107,9.22 34.178,9.22 34.839,9.882 35.61,9.882 36.937,8.555 MUX1.13
  Layer 6 w0.381: R19.2@23.992,9.539 R19.2 ; C24.2@33.858,7.566 34.44,7.566 34.595,7.722 34.595,8.376 34.767,8.548 35.459,8.548 35.729,8.278 35.729,7.553 MUX3.2 ; R31.2@34.244,1.334 34.303,1.276 34.303,0.909 34.599,0.613 36.759,0.613 37.029,0.882 37.029,1.608 MUX3.13 ; MUX4.13 37.242,16.82 37.529,17.107 40.722,17.107 40.945,16.884 40.945,16.164 40.698,15.918 40.698,15.076 40.869,14.905 40.879,14.905 41.098,14.686 41.191,14.686 C35.2
  Layer 6 w0.508: v1@23.057,8.731 v1(23.063,8.738) v1(23.063,9.525) 23.078,9.539 R19.2@23.992,9.539
  other v1: 32.944,2.972 32.944,3.585 33.591,3.585 18.918,5.385 19.787,5.385 20.534,5.385 33.223,5.842 10.643,6.477 11.405,6.477 33.198,6.477 11.354,7.595 30.251,10.592 19.05,11.176 30.251,11.201 19.05,11.836 19.025,12.471 40.767,12.7 41.507,12.7 7.442,12.827 8.151,12.832 5.258,12.852 5.994,12.852 6.731,12.852 40.742,13.513 41.504,13.513 26.314,15.773 27.33,15.773 26.314,16.434 27.356,16.434 41.097,18.872 41.097,19.533 41.783,19.533 28.321,19.837 26.848,19.863 27.584,19.863 32.893,20.269 33.579,20.269 34.265,20.269
+IN_1: R7.1 R15.2 U5.3 | length 8.5
  Layer 6 w0.381: U5.3 28.101,6.195 28.101,6.908 28.371,7.177 29.712,7.177 29.884,7.006 29.884,4.766 29.662,4.544 R15.2 29.921,3.465 29.958,3.465 31.064,2.358 31.104,2.358 R7.1
+IN_2: R5.2 R14.2 U5.5 | length 4.3
  Layer 6 w0.381: U5.5 27.382,10.645 27.382,11.402 27.071,11.713 27.071,12.868 27.147,12.945 R14.2@28.925,12.945
-IN_1: R8.1 R13.2 U5.2 | length 6.7
  Layer 6 w0.381: R8.1 24.384,2.223 24.643,2.482 24.643,2.757 25.7,3.813 R13.2 ; R13.2@25.753,3.816 26.009,4.073 26.009,4.094 26.808,4.893 28.493,4.893 28.717,5.116 U5.2
-IN_2: R4.2 R12.2 U5.6 | length 6.4
  Layer 6 w0.381: U5.6 28.101,10.645 28.101,11.947 28.455,12.301 29.713,12.301 30.357,12.945 R4.2@30.424,12.945 ; R4.2 30.714,13.277 30.883,13.277 31.866,14.26 31.866,14.285 32.126,14.545 R12.2
CCS_1: C11.2 MUX3.8 R15.1 | length 18.5
  Layer 6 w0.381: C11.2 28.379,3.699 28.633,3.699 28.894,3.437 28.894,2.866 29.637,2.124 R15.1 ; R15.1@29.662,1.946 29.865,1.946 30.566,1.245 31.85,1.245 32.182,1.576 32.182,3.997 32.405,4.22 39.314,4.22 39.663,4.569 MUX3.8
CCS_2: C12.2 MUX4.8 R14.1 | length 45.4
  Layer 2 w0.381: v1(32.36,6.248) 32.36,7.112 33.477,8.23 41.25,8.23 42.695,9.675 42.695,20.15 42.472,20.373 v1(41.074,20.373)
  Layer 6 w0.381: R14.1 28.931,16.332 31.115,18.517 32.619,18.517 33.045,18.09 33.045,7.945 32.714,7.613 32.704,7.613 32.495,7.405 32.392,7.405 C12.2 32.319,7.249 32.319,6.289 v1(32.36,6.248) ; MUX4.8 39.842,20.339 39.876,20.373 v1(41.074,20.373)
CS_AD5930: P3.7 U2.16 | length 17.3
  Layer 6 w0.381: U2.16 6.517,15.957 6.74,16.18 19.101,16.18 19.961,17.04 19.961,18.735 P3.7
CS_ADC: P2.1 U8.5 | length 34.2
  Layer 1 w0.381: P2.1 4.245,3.992 3.483,3.992 2.87,4.605 2.87,19.482 3.683,20.295 13.259,20.295 13.64,19.914 13.64,16.662 13.97,16.332 U8.5
CS_DRIVE: P2.4 U4.10 | length 18.5
  Layer 6 w0.381: P2.4 12.399,3.459 12.399,1.775 13.284,0.889 22.073,0.889 23.241,2.057 23.241,5.308 23.972,6.039 U4.10
CS_MEAS: P2.5 U6.10 | length 24.4
  Layer 1 w0.381: U6.10 24.959,11.827 24.816,11.684 24.816,10.947 25.07,10.693 v1(26.695,10.693)
  Layer 2 w0.381: v1(14.91,1.854) 23.19,1.854 25.552,4.216 25.552,9.55 v1(26.695,10.693)
  Layer 6 w0.381: P2.5 14.891,1.873 v1(14.91,1.854)
CS_MUX: MUX1.16 MUX2.16 MUX3.16 MUX4.16 P2.6 | length 46.9
  Layer 1 w0.305: MUX1.16 35.059,7.59 35.059,6.857 35.357,6.559 35.357,3.854 35.145,3.642 35.145,3.165 v1(35.082,3.102)
  Layer 1 w0.381: MUX2.16 34.949,17.533 35.535,16.947 v1(35.535,16.878)
  Layer 5 w0.381: P2.6 19.692,1.245 33.241,1.245 35.082,3.085 v1(35.082,3.102) ; v1@35.077,3.102 35.077,5.249 35.509,5.681 35.509,6.327 36.932,7.749 36.932,15.48 35.535,16.876 v1(35.535,16.878)
  Layer 6 w0.381: v1(35.082,3.102) 35.097,3.086 35.097,1.679 MUX3.16@35.113,1.663 ; MUX4.16@35.292,13.724 35.292,16.567 35.535,16.81 v1(35.535,16.878)
CTRL: P2.3 U2.13 | length 22.7
  Layer 6 w0.381: U2.13 4.567,13.237 4.262,12.932 2.662,12.932 2.438,12.709 2.438,2.464 3.15,1.753 9.271,1.753 9.776,2.257 9.776,3.47 P2.3
ELEC_1: MUX1.4 MUX2.4 MUX3.4 MUX4.4 pad.9 | length 73.6
  Layer 1 w0.305: MUX2.4 36.899,12.631 40.488,9.042 40.488,6.502 40.25,6.264 37.342,6.264 37.123,6.045 v1@37.097,6.045 ; MUX1.4 37.009,1.859 37.009,2.637 37.224,2.851 37.224,3.346 37.033,3.537 v1(37.033,6.044)
  Layer 5 w0.381: v2(22.657,24.206) 22.733,24.13 29.627,24.13 30.084,24.587 37.109,24.587 38.329,23.368 38.329,20.091 41.326,17.094 41.326,15.951 38.532,13.157 38.532,7.543 v1(37.033,6.044)
  Layer 6 w0.305: MUX3.4@36.991,7.56 MUX3.4@37.048,7.503 ; v1(37.033,6.044) 37.048,6.06 MUX3.4@37.048,7.503 ; MUX4.4@37.169,19.756 MUX4.4 37.242,19.022 36.99,18.771 34.461,18.771 33.503,17.812 33.503,11.811 37.048,8.266 MUX3.4@37.048,7.503
  Layer 6 w0.381: pad.9@22.53,25.883 22.607,25.805 22.607,24.256 v2(22.657,24.206)
ELEC_2: MUX1.5 MUX2.5 MUX3.5 MUX4.5 pad.8 | length 91.8
  Layer 1 w0.305: MUX2.5 37.558,13.639 37.558,12.658 40.945,9.271 40.945,6.198 40.605,5.858 37.993,5.858 37.803,5.668 v1(37.713,5.668) 37.65,5.604 37.65,5.371 37.63,5.351 37.63,1.83 MUX1.5
  Layer 5 w0.381: v2(11.43,28.651) 13.895,28.651 14.118,28.428 14.118,28.003 15.274,26.848 40.97,26.848 42.799,25.019 42.799,10.753 v1(37.713,5.668)
  Layer 6 w0.305: MUX3.5@37.641,7.591 MUX3.5 v1(37.713,5.668) ; 37.641,8.281 33.934,11.987 33.934,17.501 34.798,18.364 37.713,18.364 37.892,18.543 MUX4.5
  Layer 6 w0.381: v2(11.43,28.651) 11.451,28.672 11.451,31.211 pad.8
ELEC_3: MUX1.6 MUX2.6 MUX3.6 MUX4.6 pad.7 | length 105.8
  Layer 1 w0.305: MUX2.6 38.246,13.6 38.246,12.604 41.427,9.423 41.427,5.893 40.986,5.452 38.638,5.452 38.447,5.261 v1(38.357,5.261) 38.357,5.171 38.237,5.051 MUX1.6
  Layer 2 w0.381: v2(4.191,42.24) 4.191,39.827 15.85,28.169 23.673,28.169 29.794,22.047 29.794,19.025 29.185,18.415 29.185,10.033 29.439,9.779 29.439,3.658 31.826,1.27 37.16,1.27 38.357,2.467 v1(38.357,5.261)
  Layer 6 w0.305: MUX3.6@38.291,7.591 MUX3.6@38.36,7.522 ; v1(38.357,5.261) 38.36,5.263 MUX3.6@38.36,7.297 ; MUX3.6 MUX3.6@38.36,7.522 ; MUX3.6@38.379,7.317 MUX3.6@38.36,7.297 ; MUX4.6@38.516,19.796 38.516,18.45 38.024,17.958 35.052,17.958 34.379,17.285 34.379,12.117 34.729,11.768 34.968,11.768 38.36,8.376 MUX3.6@38.36,7.522 ; MUX3.6@38.36,7.297 MUX3.6@38.36,7.522
  Layer 6 w0.381: v2(4.191,42.24) 6.803,42.24 pad.7
ELEC_4: MUX1.7 MUX2.7 MUX3.7 MUX4.7 pad.6 | length 123.3
  Layer 1 w0.305: MUX2.7 38.856,13.641 38.856,12.656 41.91,9.601 41.91,5.791 40.974,4.855 v1(39.013,4.855) 39.013,4.765 38.887,4.639 MUX1.7
  Layer 2 w0.381: v2(12.497,56.591) 3.456,47.55 3.456,37.665 19.683,21.438 20.498,21.438 21.946,19.99 21.946,18.491 27.813,12.624 27.813,3.353 30.759,0.406 38.075,0.406 39.013,1.345 v1(39.013,4.855)
  Layer 6 w0.305: v1(39.013,4.855) MUX3.7@39.013,7.506 ; MUX3.7 39.013,8.612 35.623,12.002 35.623,12.561 35.223,12.961 34.961,12.961 34.813,13.11 34.813,17 35.364,17.551 38.446,17.551 39.166,18.271 MUX4.7@39.166,19.575
  Layer 6 w0.381: pad.6 11.358,55.485 11.581,55.708 11.613,55.708 v2(12.497,56.591)
ELEC_5: MUX1.12 MUX2.12 MUX3.12 MUX4.12 pad.5 | length 95.8
  Layer 1 w0.305: MUX2.12 37.549,17.696 37.965,17.28 v1(37.965,16.472) 37.877,16.472 37.686,16.281 33.782,16.281 32.944,15.443 32.944,11.662 34.217,10.39 35.628,10.39 35.864,10.389 37.587,8.667 MUX1.12
  Layer4 w0.381: v2(24.841,57.937) 31.725,57.937 39.7,49.962 39.7,37.516 34.188,32.004 34.188,27.991 37.965,24.214 v1(37.965,16.472)
  Layer 6 w0.305: MUX3.12 37.786,1.715 37.786,3.013 38.227,3.454 40.461,3.454 40.64,3.633 40.64,8.458 37.892,11.207 MUX4.12@37.892,13.928 ; MUX4.12 37.892,16.309 37.965,16.383 v1(37.965,16.472)
  Layer 6 w0.381: pad.5@22.377,58.014 22.415,57.975 24.803,57.975 v2(24.841,57.937)
ELEC_6: MUX1.11 MUX2.11 MUX3.11 MUX4.11 pad.12 | length 84.9
  Layer 1 w0.305: MUX2.11 38.199,17.968 38.725,17.441 38.725,16.474 v1(38.727,16.472) 38.727,16.425 38.563,16.261 38.563,16.225 38.197,15.859 34.02,15.859 33.376,15.215 33.376,11.805 34.385,10.796 35.796,10.796 36.093,10.796 38.232,8.657 38.232,7.677 MUX1.11@38.237,7.672
  Layer4 w0.381: v2(37.453,54.911) 40.869,51.495 40.869,37.084 35.433,31.648 35.433,28.346 38.71,25.07 v1@38.71,16.74
  Layer 6 w0.305: MUX3.11 38.436,1.715 38.436,2.622 38.854,3.04 40.81,3.04 41.046,3.277 41.046,8.712 38.542,11.217 38.542,13.674 38.516,13.699 38.516,15.872 38.519,15.875 38.519,16.217 38.727,16.425 v1(38.727,16.472)
  Layer 6 w0.381: pad.12@34.087,54.026 34.972,54.911 v2(37.453,54.911)
ELEC_7: MUX1.10 MUX2.10 MUX3.10 MUX4.10 pad.11 | length 70.1
  Layer 1 w0.305: MUX2.10 38.849,18.144 39.489,17.503 v1(39.489,16.472) 39.46,16.442 39.46,16.015 38.897,15.453 34.274,15.453 33.884,15.062 33.884,11.872 34.553,11.202 35.965,11.202 36.372,11.202 38.814,8.76 38.814,7.745 MUX1.10@38.887,7.672
  Layer4 w0.381: v1@39.472,16.589 39.472,26.732 36.525,29.678 36.525,31.445 42.164,37.084 v2(42.164,38.786)
  Layer 6 w0.305: MUX3.10 39.086,1.715 39.086,2.387 39.333,2.634 41.166,2.634 41.453,2.921 41.453,9.068 39.192,11.329 39.192,13.928 39.166,13.953 39.192,13.978 39.192,16.085 39.489,16.383 v1(39.489,16.472)
  Layer 6 w0.381: pad.11 38.121,41.722 38.777,41.066 38.777,40.92 40.911,38.786 v2(42.164,38.786)
ELEC_8: MUX1.9 MUX2.9 MUX3.9 MUX4.9 pad.10 | length 56.9
  Layer 1 w0.305: MUX2.9 39.499,18.337 40.278,17.558 40.278,16.474 v1(40.28,16.472) 40.28,15.921 39.405,15.046 34.655,15.046 34.328,14.719 34.328,12.002 34.722,11.609 36.133,11.609 36.626,11.608 39.464,8.77 39.464,7.735 MUX1.9
  Layer4 w0.381: v2(38.049,29.769) 39.141,29.769 40.217,28.693 v1@40.217,16.667
  Layer 6 w0.305: MUX3.9@39.736,2.228 41.572,2.228 41.859,2.515 41.859,9.423 39.842,11.441 MUX4.9 ; MUX4.9@39.842,13.978 39.842,15.944 40.28,16.383 v1(40.28,16.472)
  Layer 6 w0.381: pad.10@34.163,30.759 35.206,29.716 37.996,29.716 v2(38.049,29.769)
GND: C1.1 C2.2 C3.1 C4.2 C5.1 C6.1 C7.1 C8.1 C9.2 C10.1 C13.1 C14.1 C15.2 C16.1 C17.1 C18.1 C19.1 C22.1 C23.2 C24.1 C25.1 C27.2 C29.2 C30.1 C31.2 C32.1 C33.1 C34.2 C35.1 MUX1.14 MUX2.14 MUX3.14 MUX4.14 OS1.2 P3.2 R1.1 R6.1 R9.1 R22.2 R23.2 U1.2 U1.4 U2.7 U2.11 U2.12 U2.17 U2.18 U3.5 U4.4 U4.6 U5.4 U6.4 U6.6 U7.5 U8.3 U8.4 | length 5.5
  Layer 1 w0.305: R23.2@29.264,8.128 R23.2@29.439,7.953
  Layer 1 w0.381: C18.1 34.48,8.534 v1(35.128,9.183) 35.496,9.183 36.287,8.392 MUX1.14
  Layer 6 w0.305: U2.7 5.237,8.414 5.237,9.632 v1(5.258,9.652)
  other v1: 5.461,0.33 6.223,0.33 6.985,0.33 7.747,0.33 8.509,0.33 40.97,0.813 41.834,0.813 5.436,0.991 6.198,0.991 6.96,0.991 7.722,0.991 8.484,0.991 40.97,1.559 41.859,1.575 26.924,1.88 27.594,1.895 21.895,3.937 40.043,4.051 21.895,4.597 36.195,4.978 16.256,6.045 16.256,6.782 26.924,7.239 28.6,8.153 31.928,9.652 5.893,11.252 6.655,11.252 7.417,11.252 8.179,11.252 8.941,11.252 5.867,11.938 6.629,11.938 7.391,11.938 8.153,11.938 8.915,11.938 2.169,14.25 15.088,14.961 15.85,14.961 16.612,14.961 2.159,15.037 2.159,15.799 22.327,16.18 2.159,16.561 22.301,17.018 2.159,17.323 2.159,18.085 2.159,18.847 2.159,19.609 4.394,20.98 5.156,20.98 5.918,20.98 6.68,20.98 7.442,20.98
IN_AMP_OUT: R2.1 R8.2 R18.1 | length 13.9
  Layer 6 w0.381: R8.2@24.074,3.813 24.333,4.073 24.634,4.073 24.643,4.082 24.643,4.107 26.274,5.738 26.274,10.031 25.609,10.697 24.622,10.697 24.354,10.965 24.354,11.19 24.044,11.499 R18.1 23.82,12.288 24.032,12.5 25.353,12.5 25.576,12.723 25.576,13.402 R2.1@25.598,13.423
MCLK: OS1.3 U2.8 | length 11.9
  Layer 6 w0.381: U2.8 4.567,9.977 5.004,10.414 8.839,10.414 10.448,8.805 12.791,8.805 13.014,8.582 OS1.3
MEAS_1: C21.1 MUX1.8 | length 10.5
  Layer 1 w0.305: C21.1@30.481,0.643 30.333,0.495 C21.1 30.463,0.356 35.611,0.356 35.916,0.66 39.083,0.66 39.464,1.042 39.464,1.714 MUX1.8
MEAS_2: C20.1 MUX2.8 | length 13.8
  Layer 1 w0.305: C20.1@32.108,10.595 33.16,10.595 33.802,9.953 v1(33.802,9.919)
  Layer 1 w0.381: MUX2.8 39.499,12.724 41.199,11.024 v1(41.497,11.024)
  Layer 2 w0.381: v1(33.802,9.919) 33.815,9.931 40.404,9.931 v1(41.497,11.024)
MSB: P2.2 U2.10 | length 8
  Layer 6 w0.381: U2.10 3.267,5.1 3.49,4.877 5.9,4.877 P2.2
NetC3_2: C3.2 U2.2 | length 1.8
  Layer 6 w0.381: U2.2 8.467,6.993 8.536,6.924 8.536,6.77 8.646,6.661 C3.2
NetC4_1: C4.1 U2.3 | length 1.8
  Layer 6 w0.381: C4.1 7.599,6.661 7.817,6.879 U2.3
NetC7_2: C7.2 U2.6 | length 2.7
  Layer 6 w0.381: C7.2@4.389,6.635 4.5,6.635 4.61,6.745 4.61,6.857 5.117,7.364 5.563,7.364 5.832,7.634 5.832,8.359 U2.6
NetC10_2: C10.2 U4.5 | length 1.5
  Layer 6 w0.381: C10.2 19.88,8.484 U4.5
NetC11_1: C11.1 R17.2 | length 1.2
  Layer 6 w0.381: R17.2 27.301,2.893 C11.1
NetC12_1: C12.1 R16.2 | length 2.5
  Layer 6 w0.381: C12.1 32.278,9.087 32.563,9.372 32.563,9.915 32.444,10.034 32.444,10.364 R16.2
NetC17_2: C17.2 U6.5 | length 1.6
  Layer 1 w0.305: U6.5 32.067,13.827 C17.2
NetC20_2: C20.2 R25.2 | length 2.4
  Layer 1 w0.305: R25.2 29.426,9.144 30.207,9.925 30.557,9.925 31.188,10.556 C20.2
NetC21_2: C21.2 R24.2 | length 1.3
  Layer 1 w0.305: C21.2@29.401,0.498 29.401,1.816 R24.2
NetC28_1: C28.1 R27.2 | length 1.2
  Layer 1 w0.381: C28.1@19.939,8.168 R27.2@21.133,8.168
NetC28_2: C28.2 R29.2 R30.1 | length 8.4
  Layer 1 w0.381: R30.1 16.831,10.82 17.787,10.82 18.256,10.351 ; C28.2@19.482,6.768 18.836,6.768 18.256,7.348 18.256,10.351 ; R29.2 18.256,10.351
NetMUX1_15: MUX1.15 MUX2.3 R21.1 | length 22
  Layer 1 w0.305: MUX1.15 35.709,7.59 35.709,6.918 35.957,6.671 39.867,6.671 40.016,6.82 40.016,8.879 36.538,12.357 36.334,12.357 v1(36.271,12.421) ; MUX2.3 36.26,13.637 v1@36.26,12.432
  Layer 1 w0.381: v1(31.725,17.424) 32.086,17.786 R21.1
  Layer3 w0.381: v1(31.725,17.424) 31.793,17.424 31.971,17.247 32.013,17.247 36.223,13.037 36.223,12.469 v1(36.271,12.421)
NetMUX2_15: MUX2.15 MUX3.3 R26.1 | length 18.4
  Layer 1 w0.381: MUX2.15 35.633,19.49 35.633,18.621 36.576,17.678 v1(36.576,16.878)
  Layer4 w0.381: v1(36.144,6.045) 36.193,6.094 36.193,6.675 36.932,7.414 36.932,16.523 v1(36.576,16.878)
  Layer 6 w0.305: v1(36.144,6.045) 36.144,6.107 36.413,6.376 MUX3.3
  Layer 6 w0.381: R26.1@34.129,5.131 35.309,5.131 35.532,5.354 35.532,5.364 36.144,5.976 v1(36.144,6.045)
NetMUX3_15: MUX3.15 MUX4.3 R31.1 | length 32.2
  Layer 2 w0.381: v1(35.865,3.106) 35.865,2.23 35.642,2.007 32.131,2.007 30.785,3.353 30.785,6.782 32.766,8.763 32.766,9.347 32.766,15.697 36.551,19.482 v1(36.551,20.98)
  Layer 6 w0.381: R31.1 34.194,3.223 34.708,3.737 35.358,3.737 35.73,3.365 35.73,3.31 35.865,3.175 v1(35.865,3.106) 35.763,3.005 MUX3.15 ; MUX4.3@36.551,19.87 v1(36.551,20.98)
NetR1_2: R1.2 U2.1 | length 2.2
  Layer 6 w0.381: U2.1 9.117,7.223 9.258,7.082 9.258,7.063 9.64,6.681 9.715,6.681 9.824,6.572 R1.2@9.824,6.497
NetR2_2: R2.2 R5.1 | length 1.5
  Layer 6 w0.381: R2.2@25.598,14.523 27.033,14.523 R5.1
NetR3_2: R3.2 R7.2 | length 3.8
  Layer 6 w0.381: R3.2 30.957,4.182 31.079,4.06 31.079,3.958 31.443,3.594 R7.2@31.468,3.594
NetR18_2: R18.2 U3.7 | length 3.9
  Layer 6 w0.381: U3.7 21.446,12.505 22.34,13.399 R18.2
NetR19_1: R19.1 U4.7 | length 3.2
  Layer 6 w0.381: U4.7 25.568,7.539 25.792,7.762 25.792,8.943 25.181,9.554 R19.1
NetR20_1: R20.1 U6.7 | length 1.9
  Layer 1 w0.381: R20.1 24.435,13.497 24.605,13.327 U6.7
NetR22_1: R22.1 R24.1 U7.1 | length 3.2
  Layer 1 w0.305: U7.1 30.953,4.642 31.026,4.569 31.026,3.204 R24.1@31.026,1.591
NetR23_1: R23.1 R25.1 U7.4 | length 3
  Layer 1 w0.305: U7.4 30.8,7.664 31.09,7.953 R25.1@31.09,9.452 ; R25.1@31.191,9.401 R25.1@31.217,9.376
NetR27_1: R27.1 U7.7 | length 5.9
  Layer 1 w0.381: R27.1@21.463,6.655 21.742,6.375 21.742,5.69 22.14,5.292 U7.7
NetR30_2: R30.2 U8.2 | length 7.7
  Layer 1 w0.381: U8.2 11.43,11.258 11.653,11.481 15.088,11.481 16.134,12.528 16.404,12.528 R30.2
OUT_1: R13.1 R17.1 U5.1 | length 6.2
  Layer 6 w0.381: R13.1 25.749,2.213 26.009,2.473 26.009,2.689 26.949,3.629 27.012,3.629 27.122,3.738 27.122,3.888 27.644,4.41 28.845,4.41 29.366,4.932 U5.1
OUT_2: R12.1 R16.1 U5.7 | length 6.4
  Layer 6 w0.381: U5.7 28.728,10.622 28.728,11.595 28.951,11.818 29.954,11.818 30.411,12.275 31.051,12.275 31.222,12.447 31.222,12.462 31.445,12.685 31.891,12.685 R12.1 32.385,12.71 R16.1@32.385,11.574
OUT_+: R9.2 U2.19 U3.4 | length 9.4
  Layer 6 w0.381: U2.19 8.501,14.304 8.501,15.091 8.725,15.314 9.571,15.314 9.794,15.091 9.794,14.158 10.045,13.907 10.584,13.907 10.67,13.821 10.67,13.805 U3.4
OUT_-: R6.2 U2.20 U3.1 | length 8.7
  Layer 6 w0.381: U2.20 9.151,14.235 9.151,12.634 9.901,11.884 10.459,11.884 R6.2 ; R6.2@10.535,11.855 U3.1
RG_1: U3.2 U4.2 | length 9.4
  Layer 6 w0.381: U3.2@15.863,12.471 U3.2 16.696,12.505 17.851,11.351 17.851,7.245 18.556,6.539 U4.2
RG_1A: U6.2 U7.2 | length 10.9
  Layer 1 w0.305: U6.2 29.484,12.327 27.965,10.808 27.965,6.607 29.281,5.292 U7.2
RG_2: U3.3 U4.3 | length 9.4
  Layer 6 w0.381: U3.3 16.891,13.155 18.384,11.662 18.384,7.575 18.92,7.039 U4.3
RG_2A: U6.3 U7.3 | length 27.4
  Layer 1 w0.305: U6.3 29.21,12.827 27.534,11.151 27.534,4.216 26.302,2.984 26.302,1.487 26.62,1.168 28.194,1.168 28.677,1.651 28.677,2.42 28.855,2.598 30.131,2.598 30.309,2.42 30.309,1.249 30.458,1.1 31.569,1.1 31.779,1.31 31.779,5.622 31.532,5.869 30.873,5.869 U7.3
V_DAT: MUX1.3 P3.5 U2.14 U4.8 U6.8 | length 81.9
  Layer 1 w0.305: MUX1.3 36.359,1.859 36.359,2.742 36.627,3.009 v1(36.627,3.099)
  Layer 1 w0.381: P3.5 14.863,18.774 14.863,19.994 15.85,20.98 24.79,20.98 24.798,20.973 24.976,20.973 25.781,20.168 25.781,19.533 26.467,18.847 29.19,18.847 29.413,18.624 29.413,13.945 28.296,12.827 U6.8
  Layer4 w0.381: P3.5 14.891,17.519 16.205,16.205 19.482,16.205 21.536,14.151 21.536,9.014 25.444,5.105 34.823,5.105 36.578,3.351 36.578,3.147 v1(36.627,3.099)
  Layer 6 w0.381: U2.14 5.217,15.84 4.369,16.688 3.581,16.688 2.87,17.399 2.87,19.837 3.277,20.244 14.351,20.244 14.891,19.703 P3.5 ; v1(22.924,7.556) 22.961,7.556 23.478,7.039 U4.8
V_DAT_MISO: P3.4 U8.6 | length 4.6
  Layer 1 w0.381: P3.4 12.7,18.397 U8.6
V_SCLK: MUX1.1 MUX2.1 MUX3.1 MUX4.1 P3.6 U2.15 U4.9 U6.9 U8.7 | length 99.5
  Layer 1 w0.305: MUX2.1 34.962,13.635 34.962,12.378 v1(34.976,12.365)
  Layer 1 w0.381: U8.7 11.466,14.226 11.466,12.72 11.689,12.497 14.966,12.497 15.189,12.72 15.189,13.614 15.773,14.199 16.942,14.199 17.431,14.688 17.431,17.471 ; P3.6 17.431,17.471 ; U6.9 24.3,12.327 20.343,16.284 18.618,16.284 17.431,17.471 ; v1(34.72,6.284) 34.72,6.216 34.442,5.938 34.442,2.843 34.987,2.299 MUX1.1
  Layer 2 w0.381: P3.6 17.431,15.92 17.655,15.697 19.228,15.697 21.057,13.868 21.057,7.188 21.92,6.325 v1(22.962,6.325)
  Layer 5 w0.381: P3.6 17.431,19.057 19.38,21.006 30.099,21.006 31.699,19.406 v1(34.163,19.406) 34.9,18.669 34.9,12.391 v1@34.925,12.366 ; v1(34.72,6.284) 34.784,6.284 35.995,7.495 35.995,11.151 34.976,12.17 v1(34.976,12.365)
  Layer 6 w0.381: U2.15@5.872,14.275 5.872,16.464 6.375,16.967 17.213,16.967 17.437,17.19 P3.6@17.437,18.74 ; v1(22.962,6.325) 22.98,6.325 23.194,6.539 U4.9 ; v1(34.163,19.406) 34.868,19.406 MUX4.1 ; v1(34.72,6.284) 34.769,6.333 34.769,6.662 35.079,6.971 35.079,7.484 MUX3.1
pads on no net: MUX4.15 P2.7 U2.9

## Polygon pours and split planes (outlines as drawn)
GND on Layer 6 "GND_L06_P055" (solid, pour order 55): 0,69.596 47.269,69.596 47.269,0 0,0
+5V on Layer 6 "+5V_L06_P000" (solid, pour order 0): 27.833,17.758 25.801,17.758 25.801,15.218 27.833,15.218
+5V on Layer 6 "+5V_L06_P001" (solid, pour order 1): 30.455,20.511 25.629,20.511 25.629,18.682 30.455,18.682
+2V5 on Layer 6 "+2V5_L06_P002" (solid, pour order 2): 25.375,20.485 22.2,20.485 22.2,18.682 25.375,18.682
GND on Layer 6 "GND_L06_P003" (solid, pour order 3): 30.455,15.229 30.455,18.682 22.073,18.682 22.073,15.229
+2V5 on Layer 6 "+2V5_L06_P014" (solid, pour order 14): 31.496,8.992 31.496,7.696 26.594,7.696 26.594,9.957 28.27,9.957 28.27,8.992
+2V5 on Layer 6 "+2V5_L06_P017" (solid, pour order 17): 29.896,13.919 32.69,13.919 32.69,18.253 30.886,18.253 30.886,15.57 29.896,15.57
+3V3 on Layer 6 "+3V3_L06_P019" (solid, pour order 19): 15.672,6.858 15.672,4.75 12.141,4.75 12.141,5.613 14.122,5.613 14.122,6.858
+3V3 on Layer 6 "+3V3_L06_P020" (solid, pour order 20): 14.3,7.239 17.577,7.239 17.577,9.703 14.3,9.703
+5V on Layer 6 "+5V_L06_P026" (solid, pour order 26): 21.234,12.116 21.234,11.176 20.371,11.176 20.371,9.855 18.669,9.855 18.669,12.979 19.355,12.979 19.355,12.116
+5V on Layer 6 "+5V_L06_P027" (solid, pour order 27): 17.526,6.299 21.26,6.299 21.26,4.801 17.501,4.801
+5V on Layer 6 "+5V_L06_P030" (solid, pour order 30): 29.113,11.72 31.572,11.72 31.572,10.262 29.845,10.262 29.845,9.627 29.083,9.627
+5V on Layer 6 "+5V_L06_P042" (solid, pour order 42): 31.394,21.184 36.322,21.184 36.322,18.948 33.528,18.948 33.528,19.761 31.394,19.761
+5V on Layer 6 "+5V_L06_P043" (solid, pour order 43): 40.284,15.08 40.284,12.116 42.316,12.116 42.316,15.058
+5V on Layer 6 "+5V_L06_P045" (solid, pour order 45): 32.487,4.216 32.487,0.864 34.646,0.864 34.646,4.216
+5V on Layer 6 "+5V_L06_P047" (solid, pour order 47): 32.817,8.128 32.817,4.953 34.823,4.953 34.823,8.128
+3V3 on Layer3 "+3V3_L03_P005" (solid, pour order 5): 8.382,20.066 11.176,20.066 11.176,9.093 8.382,9.093
+3V3 on Layer3 "+3V3_L03_P006" (solid, pour order 6): 5.715,10.135 5.715,9.093 14.118,9.093 14.118,5.817 12.243,5.817 12.243,4.724 15.877,4.724 15.877,7.62 17.577,7.62 17.577,10.135
+2V5 on Layer3 "+2V5_L03_P012" (solid, pour order 12): 21.996,21.311 32.182,21.311 32.182,15.255 31.065,15.255 31.065,20.329 25.324,20.329 25.324,18.136 25.324,10.668 21.996,10.668
+2V5 on Layer3 "+2V5_L03_P015" (solid, pour order 15): 21.996,12.319 28.194,12.319 28.194,7.112 26.467,7.112 26.467,10.668 21.996,10.668
+5V on Layer3 "+5V_L03_P024" (solid, pour order 24): 3.404,20.168 6.121,20.168 6.121,13.52 8.291,13.501 8.291,12.421 6.121,12.421 6.121,10.389 5.131,10.389 5.131,8.661 11.887,8.661 11.887,4.978 3.404,4.978
+5V on Layer3 "+5V_L03_P025" (solid, pour order 25): 29.947,20.168 29.947,18.694 27.864,18.694 27.864,14.681 25.73,14.681 25.73,20.168
+5V on Layer3 "+5V_L03_P028" (solid, pour order 28): 18.39,13.106 18.39,2.921 21.488,2.921 21.488,7.595 23.901,7.595 23.901,10.389 19.812,10.389 19.812,13.106
+5V on Layer3 "+5V_L03_P033" (solid, pour order 33): 21.488,2.921 25.832,2.921 25.832,0.076 31.318,0.076 31.318,14.681 25.73,14.681 25.73,13.056 28.88,13.056 28.88,5.588 21.488,5.588
+5V on Layer3 "+5V_L03_P034" (solid, pour order 34): 11.887,4.978 11.887,2.057 25.832,2.057 25.832,0.076 8.433,0.076 8.433,5.055
+5V on Layer3 "+5V_L03_P041" (solid, pour order 41): 31.318,0.076 42.342,0.076 42.342,21.387 31.318,21.387
GND on Layer 1 "GND_L01_P064" (solid, pour order 64): 0,66.675 46.812,66.675 46.812,0 0,0
+2V5 on Layer 1 "+2V5_L01_P011" (solid, pour order 11): 19.631,10.82 22.936,10.82 22.936,13.183 19.606,13.183
+5V on Layer 1 "+5V_L01_P032" (solid, pour order 32): 32.537,12.344 32.537,10.211 29.484,10.211 29.484,12.327
+5V on Layer 1 "+5V_L01_P044" (solid, pour order 44): 40.31,14.961 42.037,14.961 42.037,11.862 40.361,11.862
+5V on Layer 1 "+5V_L01_P046" (solid, pour order 46): 32.614,4.242 32.614,1.854 34.163,1.854 34.163,4.242
+5V on Layer 1 "+5V_L01_P048" (solid, pour order 48): 31.902,7.798 32.614,7.798 32.614,4.242 34.595,4.242 34.595,8.026 33.249,8.026 33.249,8.966 31.902,8.997
+5V on Layer 1 "+5V_L01_P049" (solid, pour order 49): 40.716,17.247 40.716,19.863 42.266,19.863 42.266,17.247
+5V on Layer 1 "+5V_L01_P053" (solid, pour order 53): 23.52,17.374 23.52,14.199 28.702,14.199 28.702,17.348
+5V on Layer 1 "+5V_L01_P059" (solid, pour order 59): 34.671,20.98 32.258,20.98 32.258,18.288 34.646,18.288 34.646,18.263
+5V on Layer 1 "+5V_L01_P061" (solid, pour order 61): 10.846,16.612 10.846,7.036 9.601,7.036 9.601,12.421 4.089,12.421 4.089,14.326 9.601,14.326 9.601,16.612
+5V on Layer 1 "+5V_L01_P062" (solid, pour order 62): 9.601,6.071 12.04,6.071 12.04,8.082 9.601,8.082
GND on Layer 2 "GND_L02_P051" (solid, pour order 51): 0,0 0,68.504 49.149,68.504 49.149,0
GND on Layer 5 "GND_L05_P057" (solid, pour order 57): 0,0 50.698,0 50.698,69.393 0,69.393 0,23.012
GND on Layer4 "GND_L04_P058" (solid, pour order 58): 0,0 48.311,0 48.311,68.428 0,68.428

## Silkscreen, mask and mechanical layers (free items; w line width, h text height)
Top Overlay:
  text "Wearable EIT" at 36.52,58.476 h1.5 r270
  text "EITWatch" at 39.108,58.352 h3 r270
Mechanical 1:
  circle w0.254: c22.477,42.351 r13
  pour cut-out: 22.477,29.351 cw(c22.477,42.351) 9.477,42.351 cw(c22.477,42.351) 22.477,55.351 cw(c22.477,42.351) 35.477,42.351 cw(c22.477,42.351)